# Altium PCB DAP-PCB-REV-4.PcbDoc (part 1 of 4)
Units mil, origin at the board's own origin, x right, y up, seen from the top; angles counter-clockwise.
Board outline 2559.06 x 2559.06 mil, 6 copper layers (L1 (SIG/PWR), L2 (GND), L3 (SIG), L4 (PWR), L5 (GND), L6 (SIG/PWR)), stack 64.976 mil thick; 309 components, 179 nets, 965 pads, 300 vias.
Unrouted connection lines stored in the file: 157.
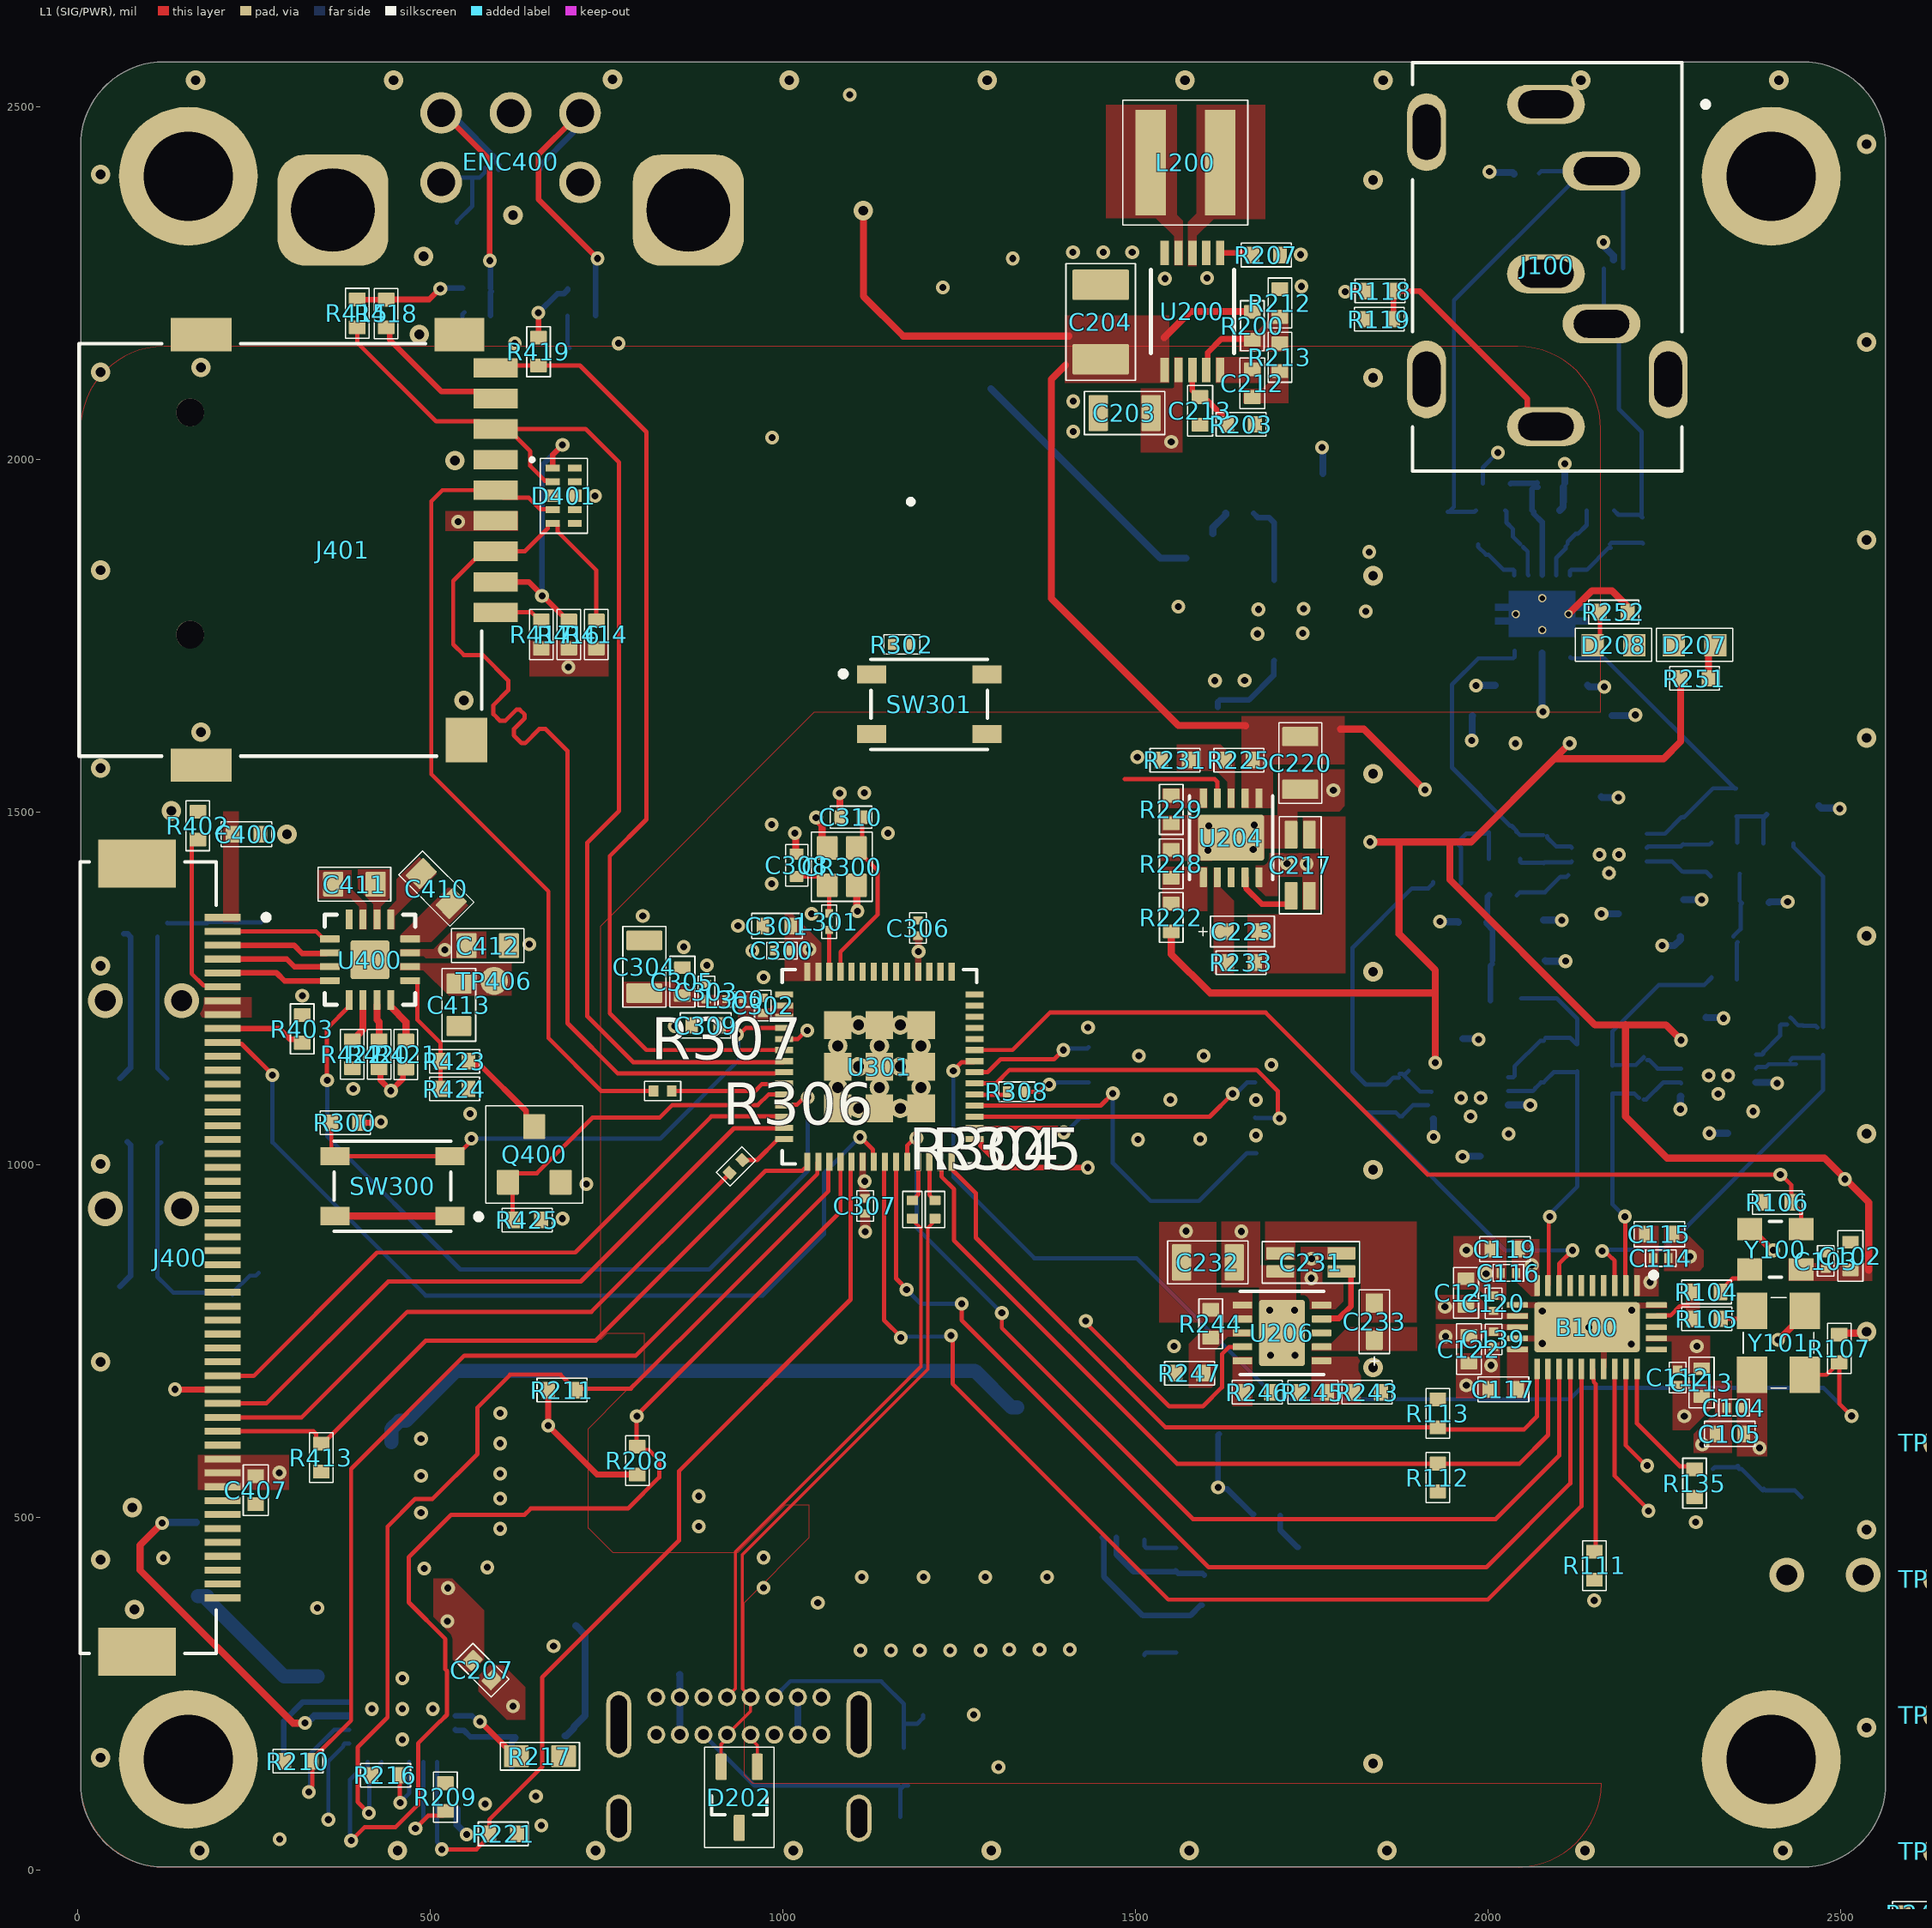
[diagram p0: L1 (SIG/PWR) view]
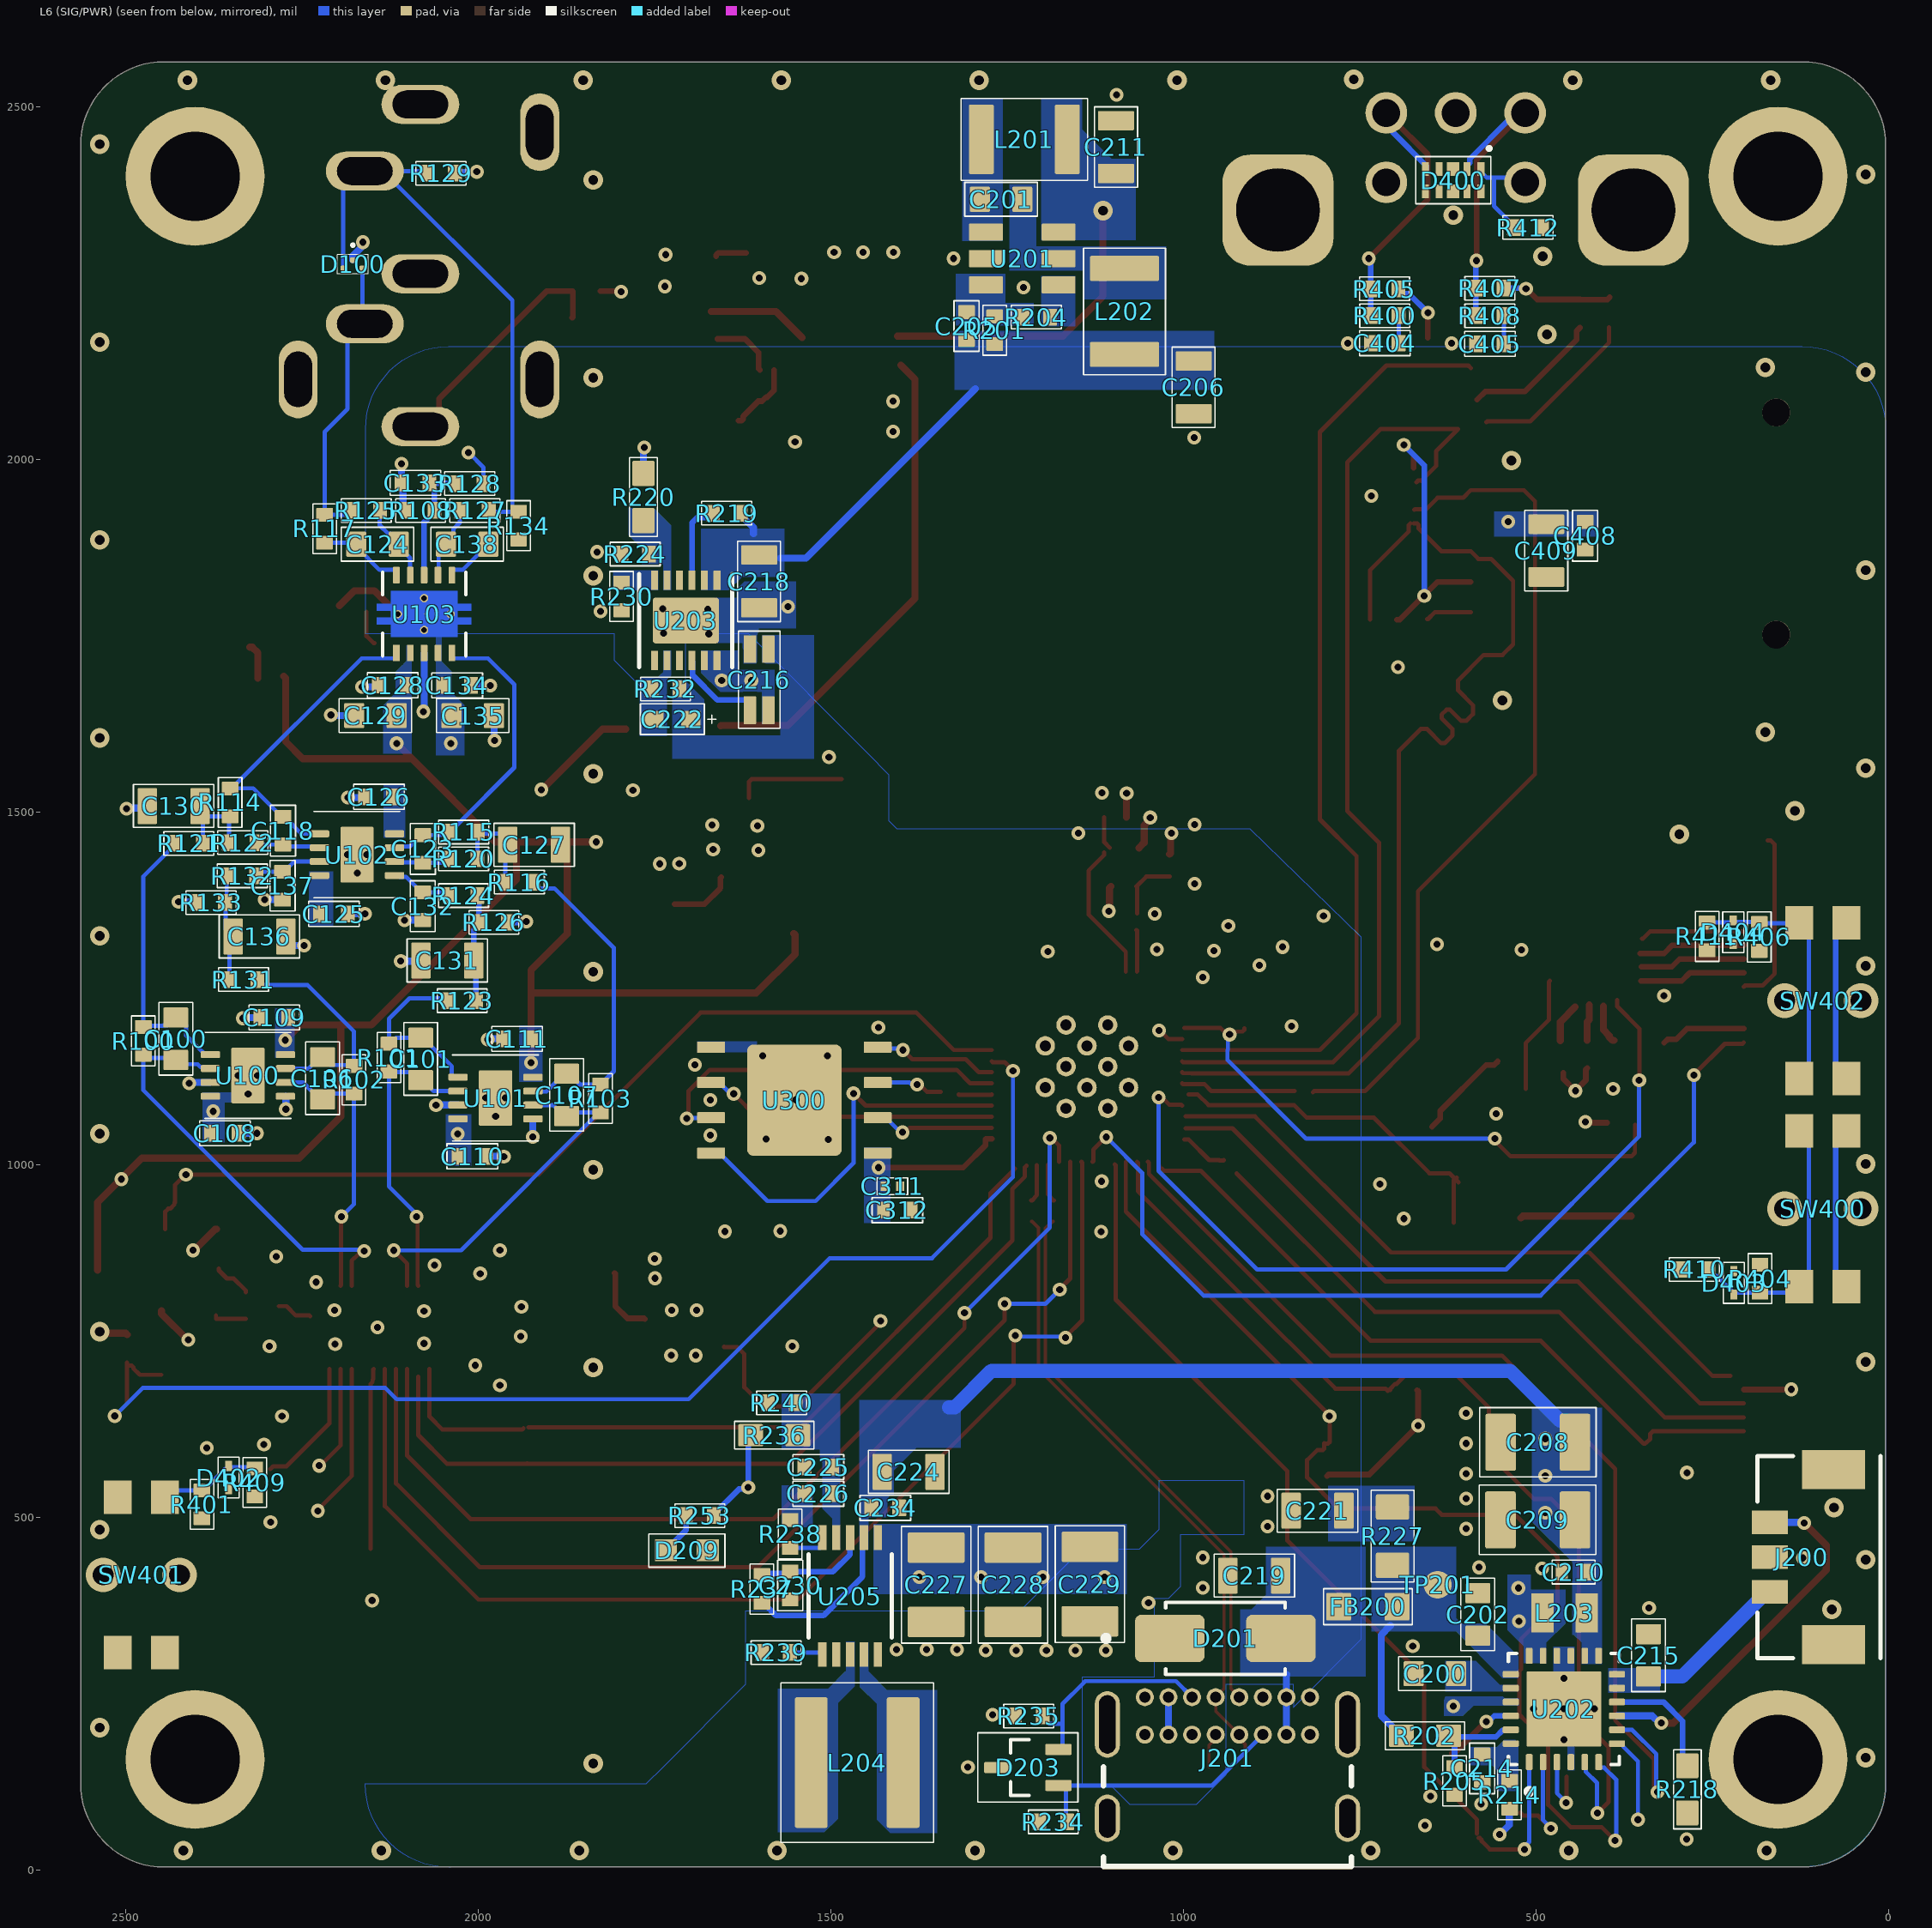
[diagram p1: L6 (SIG/PWR) view, seen from below]
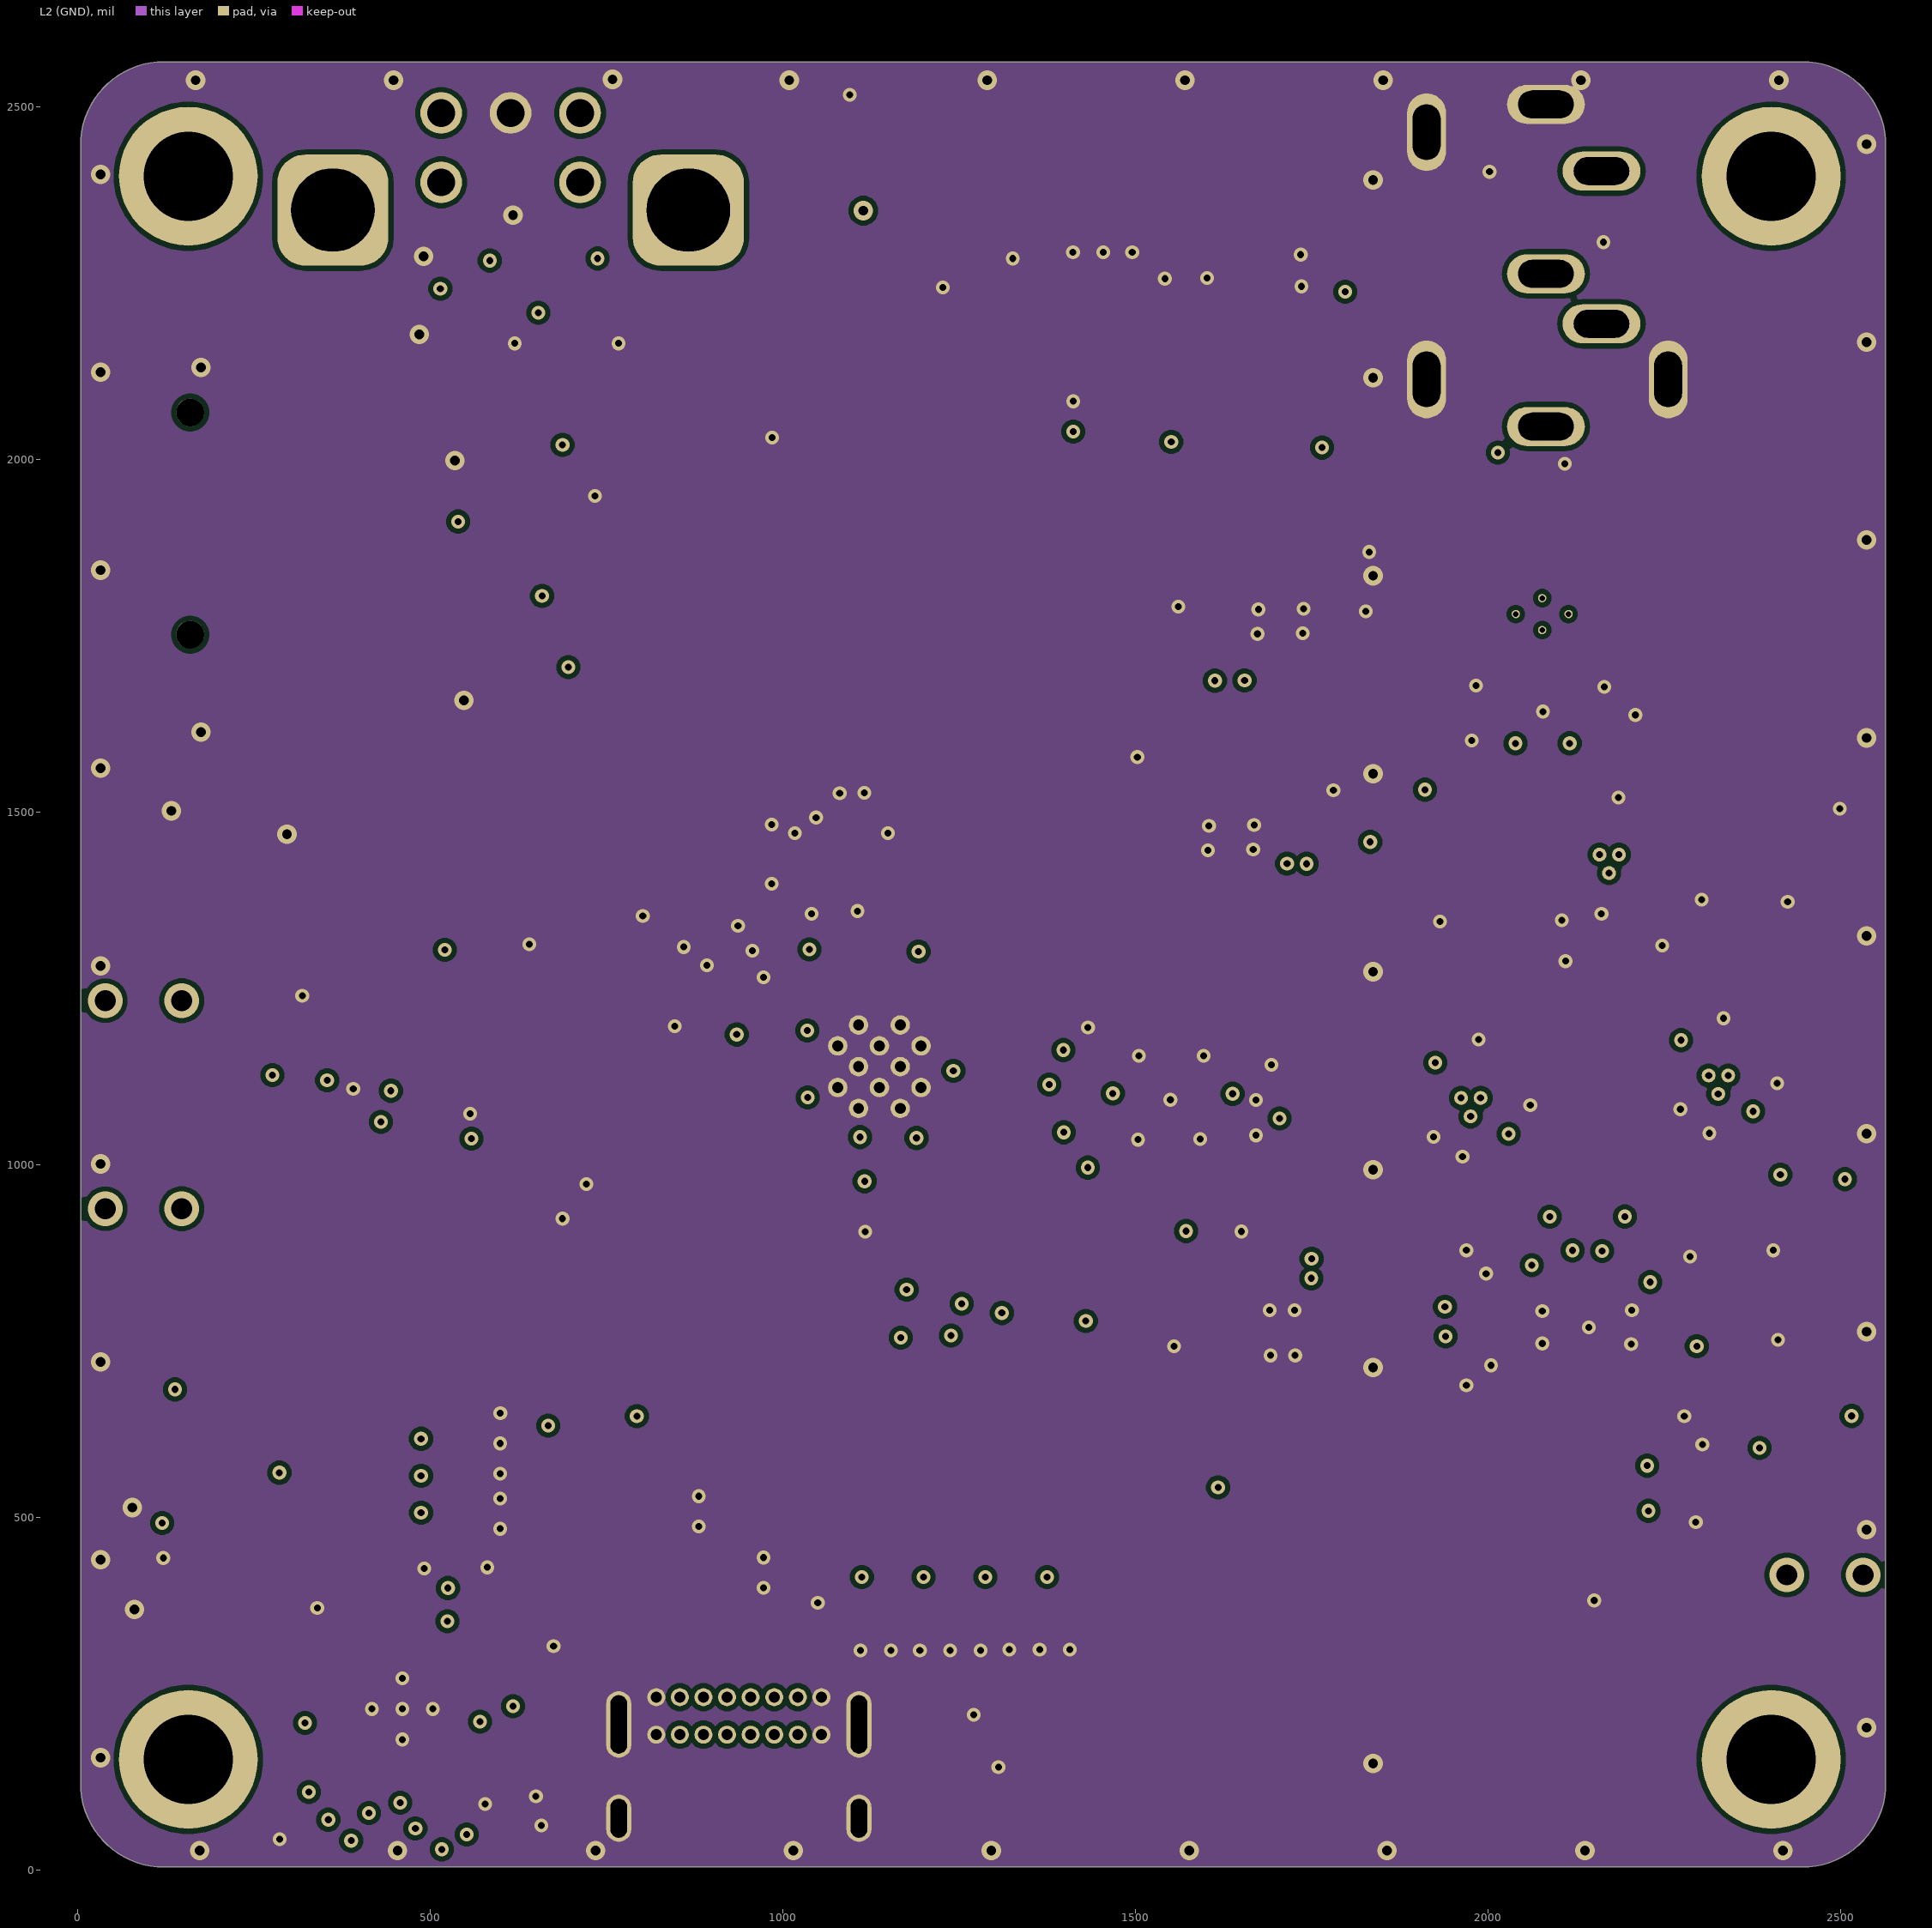
[diagram p2: L2 (GND)]
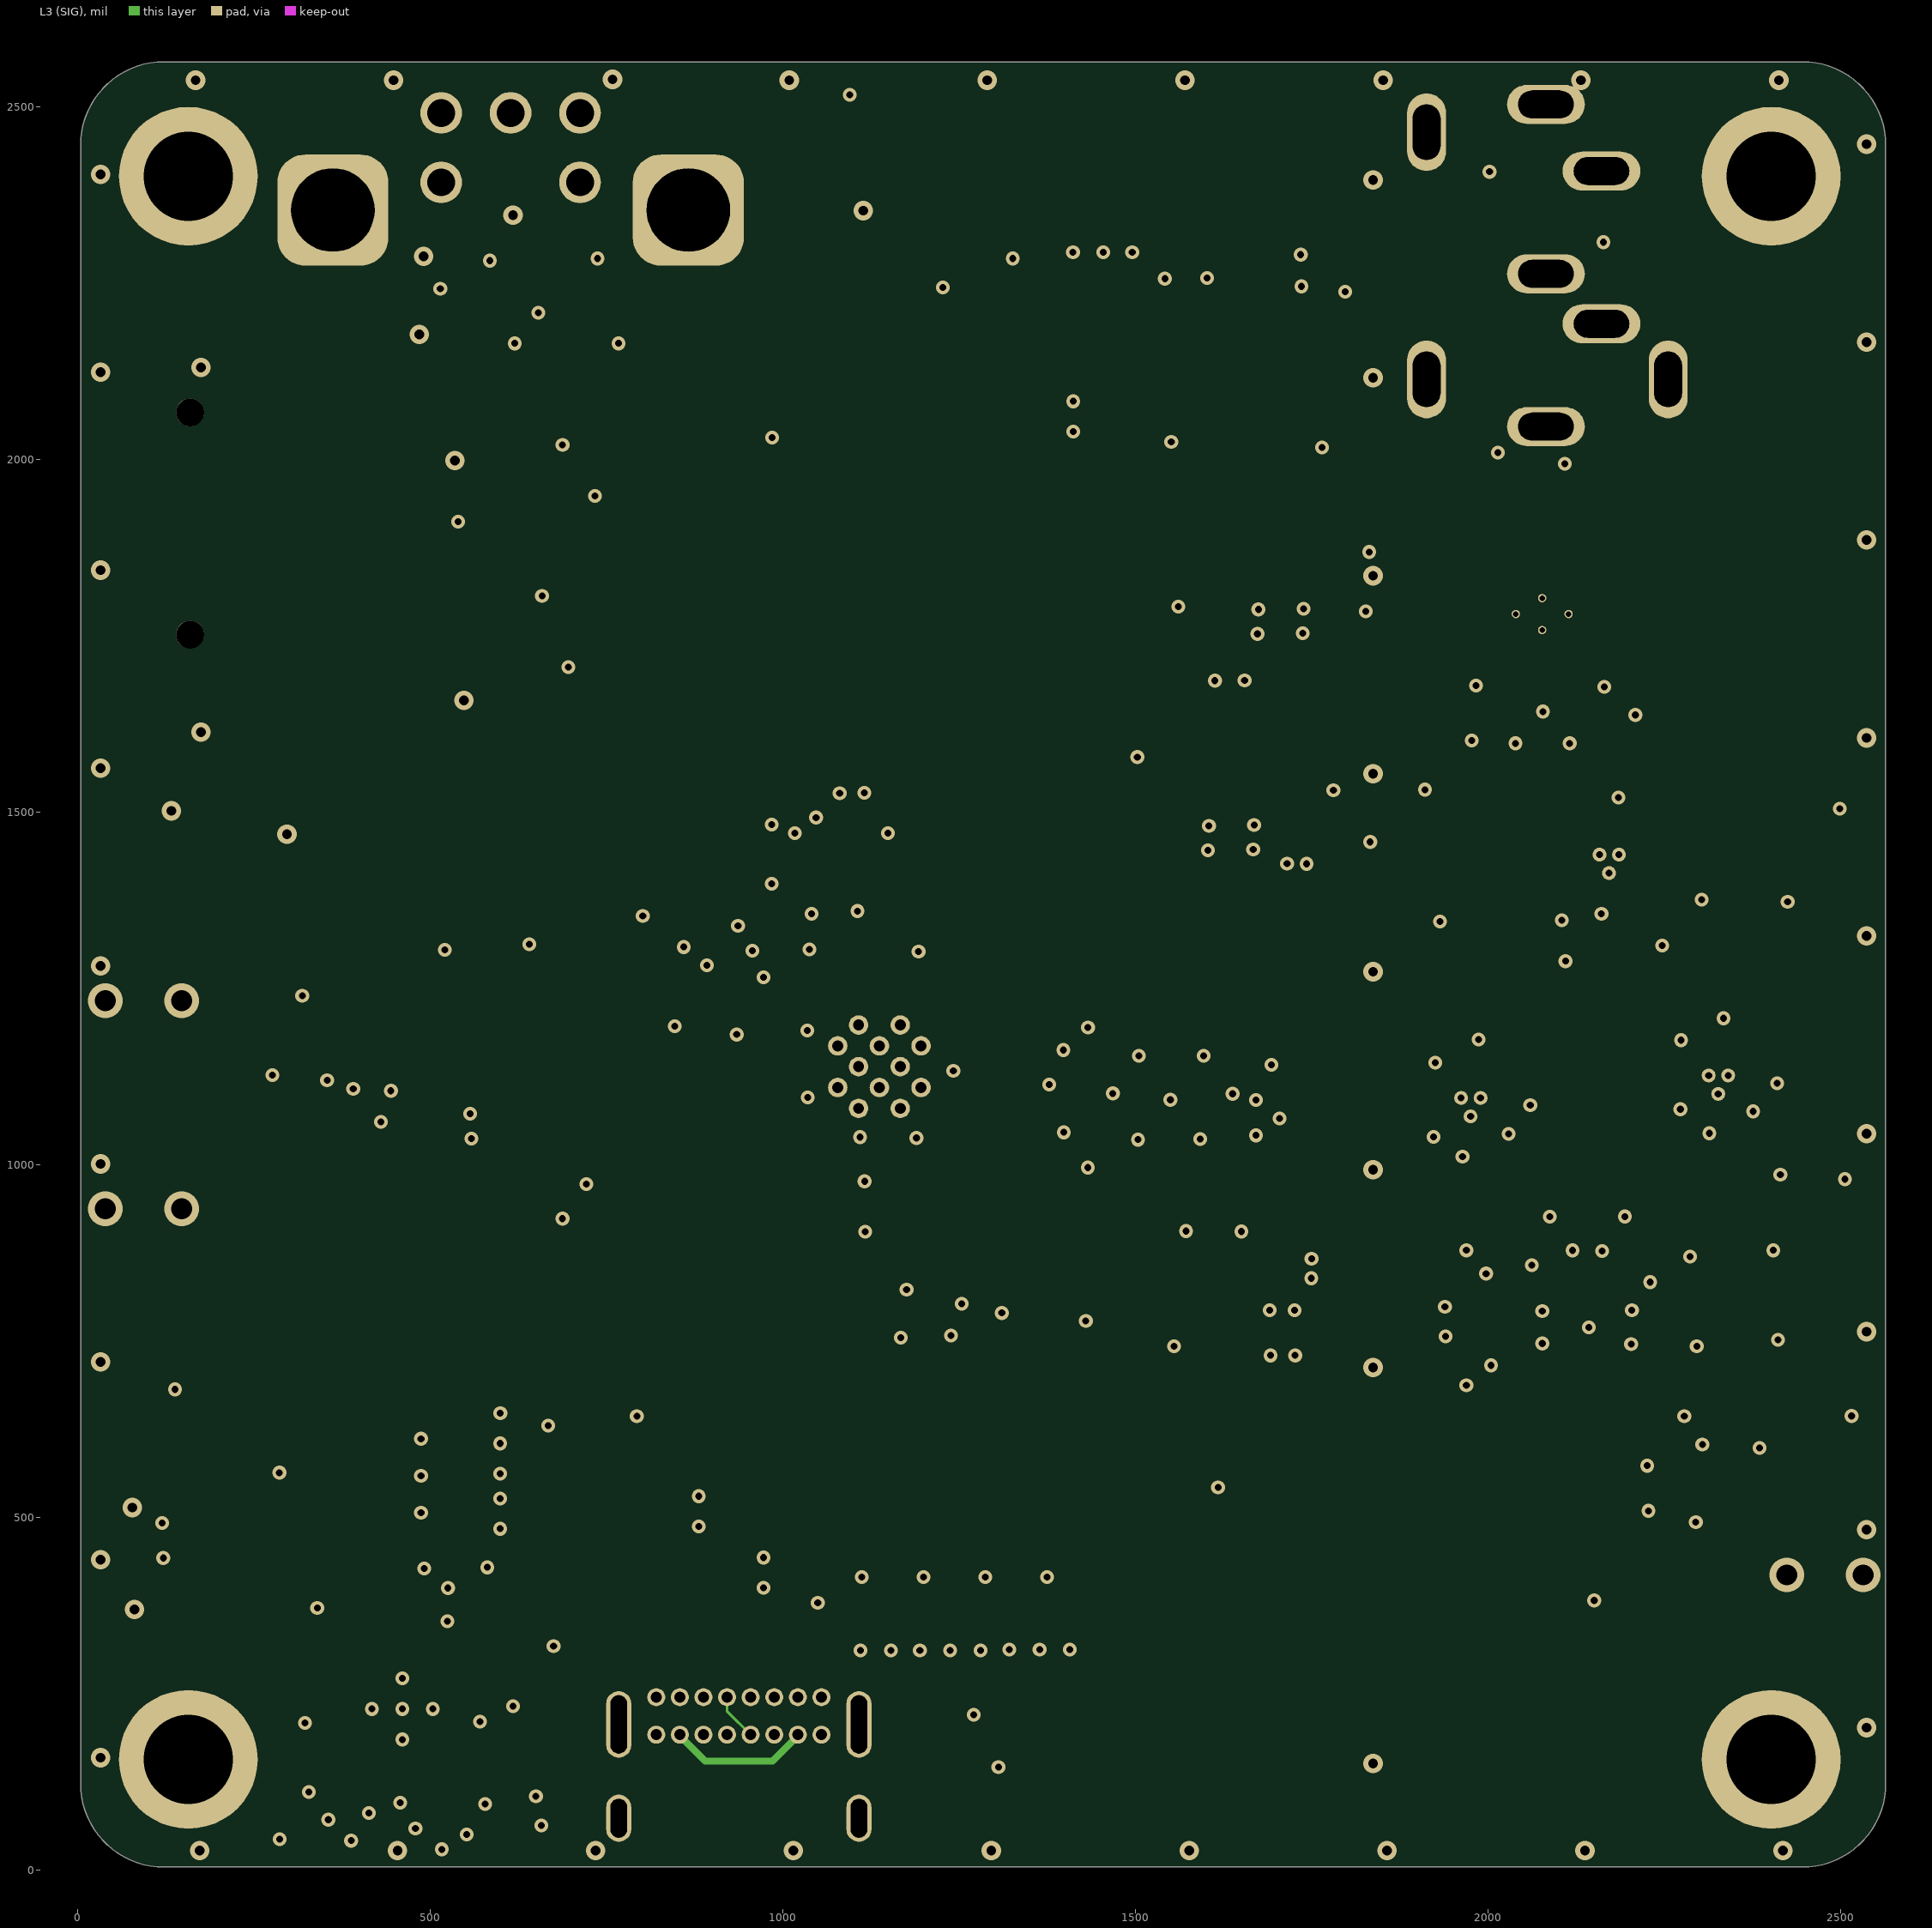
[diagram p3: L3 (SIG)]
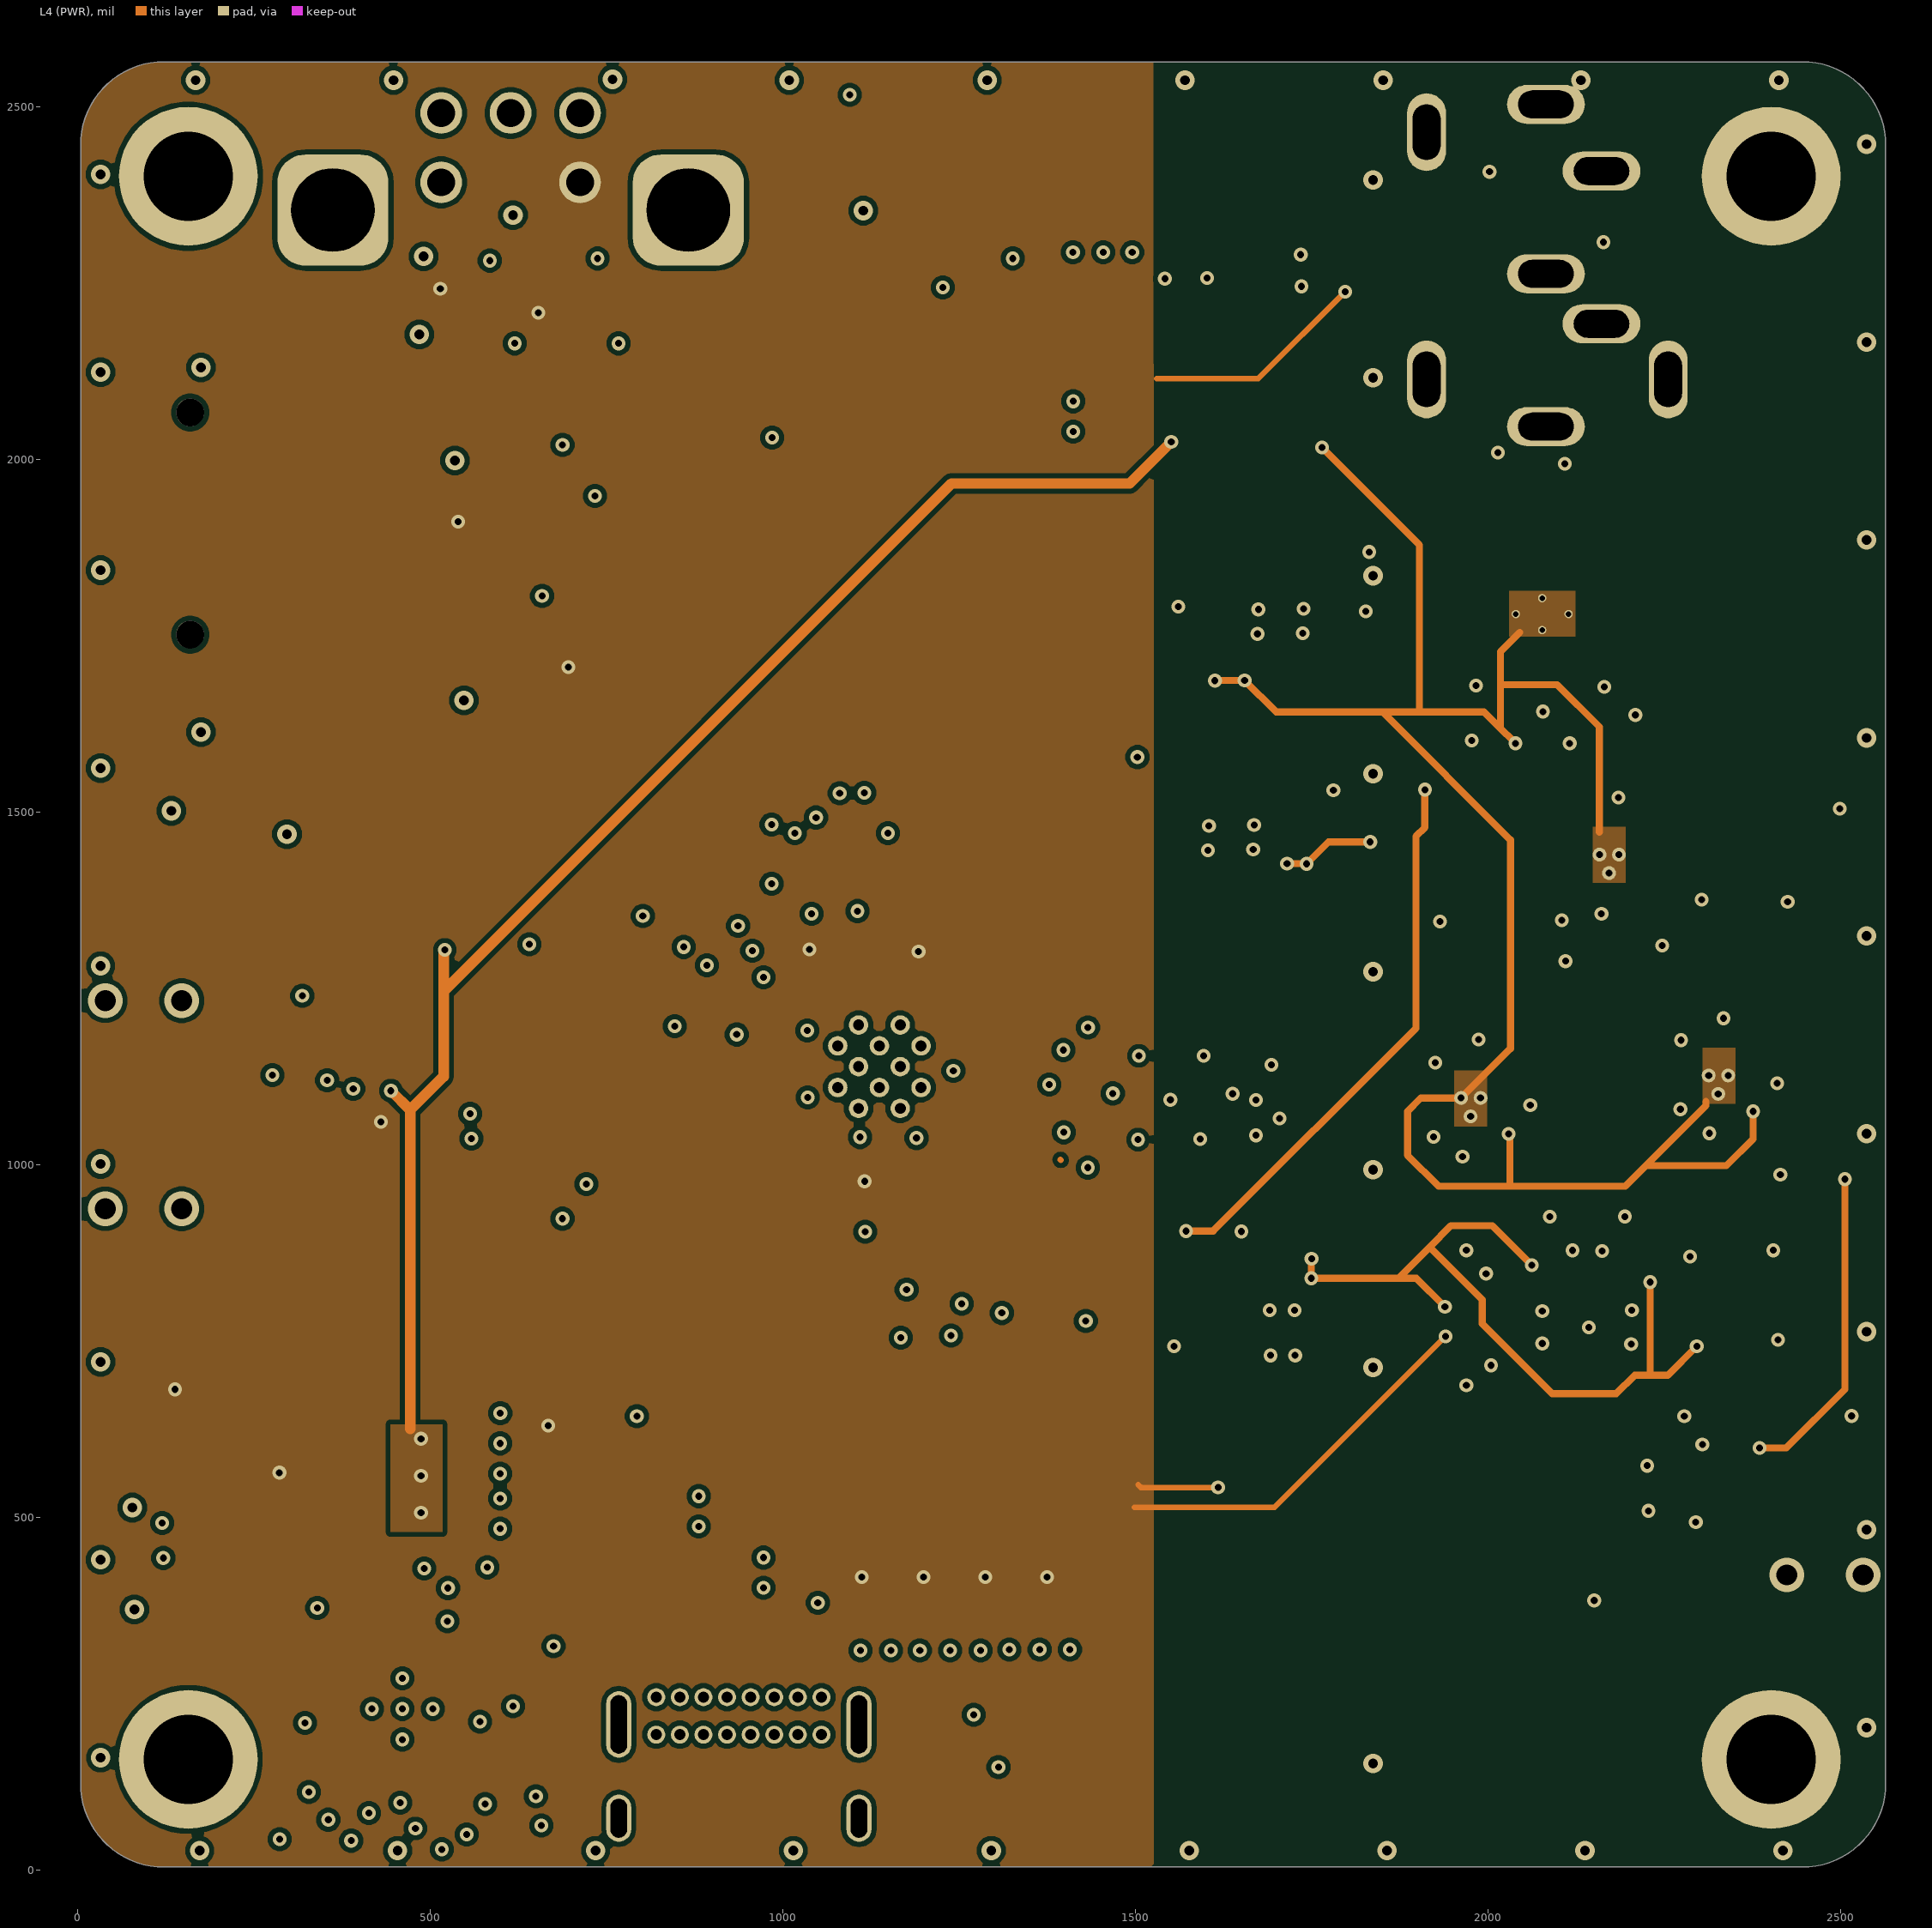
[diagram p4: L4 (PWR)]

## Layer stack, top to bottom
Top Solder: solder mask 1.2205, Solder Resist, Dk 4
L1 (SIG/PWR): signal copper 1.378
Dielectric 1: prepreg 3.9134, 3313, Dk 4.1
L2 (GND): signal copper 0.5984
Dielectric 8: core 3.937, Core-009, Dk 4.6
L3 (SIG): signal copper 0.5984
Dielectric 6: prepreg 8.2835, 7628, Dk 4.4
Dielectric 2: core 27.5591, Core-009, Dk 4.6
Dielectric 7: prepreg 8.2835, 7628, Dk 4.4
L4 (PWR): signal copper 0.5984
Dielectric 4: core 3.937, Core-009, Dk 4.6
L5 (GND): signal copper 0.5984
Dielectric 3: prepreg 3.9134, 3313, Dk 4.1
L6 (SIG/PWR): signal copper 1.378
Bottom Solder: solder mask 1.2205, Solder Resist, Dk 4

## Board outline
4.84,122.95 4.84,2445.79 cw(c122.95,2445.79) 122.95,2563.9 2445.79,2563.9 cw(c2445.79,2445.79) 2563.9,2445.79 2563.9,122.95 cw(c2445.79,122.95) 2445.79,4.84 122.95,4.84 cw(c122.95,122.95)

## Design rules (kind name [scope] priority, off if disabled: settings)
Clearance [All] p1: gap=7 ignorepadtopadclearanceinfootprint=FALSE except(4.72: Arc-Arc Arc-Track Track-Track; 5: SMDPad-SMDPad)
DiffPairsRouting [All] p1: maxlimit=5 minlimit=5 mostfreqgap=5 toplayer_minwidth=4.75 toplayer_maxwidth=4.75 toplayer_prefwidth=4.75 midlayer1_minwidth=3.22 midlayer1_maxwidth=3.22 midlayer1_prefwidth=3.22 midlayer2_minwidth=3.98 midlayer2_maxwidth=3.98 midlayer2_prefwidth=3.98 midlayer3_minwidth=3.98 midlayer3_maxwidth=3.98 midlayer3_prefwidth=3.98 midlayer4_minwidth=3.17 midlayer4_maxwidth=3.17 midlayer4_prefwidth=3.17 bottomlayer_minwidth=4.75 bottomlayer_maxwidth=4.75 bottomlayer_prefwidth=4.75 impedanceprofiledriven=TRUE impedanceprofileid={D838837C-7825-4B87-9FED-7A096DA422F5} impedanceprofilevalue=90.000000 maxuncoupledlength=500
MinimumSolderMaskSliver [All] p1: minsoldermaskwidth=3.15
PlaneConnect [All] p1: planeconnectstyle=Direct reliefexpansion=20 reliefentries=4 reliefconductorwidth=10 reliefairgap=10
PolygonConnect Thermal_Relief [D207] p1: connectstyle=Relief reliefconductorwidth=10 reliefentries=4 polygonreliefangle="90 Angle" airgapwidth=10
PolygonConnect [All] p2: connectstyle=Direct reliefconductorwidth=10 reliefentries=4 polygonreliefangle="90 Angle" airgapwidth=10
RoutingVias [All] p1: holewidth=28 width=50 viastyle="Through Hole" minholewidth=28 minwidth=50 maxholewidth=28 maxwidth=50
SilkToSilkClearance [All] p1: silktosilkclearance=4
SilkToSolderMaskClearance [IsPad] p1: minsilkscreentomaskgap=2.95 clearancetoexposedcopper=TRUE
SolderMaskExpansion [All] p1: expansion=4 istentingtop=FALSE
SupplyNets "Schematic Supply Nets_2" [InNet('+3V3_DIG')] p1: voltage=0.000
SupplyNets "Schematic Supply Nets_4" [InNet('-3V3')] p2: voltage=0.000
SupplyNets "Schematic Supply Nets_3" [InNet('+3V3_DAC')] p3: voltage=0.000
SupplyNets "Schematic Supply Nets" [InNet('+3V3_ANALOG')] p4: voltage=0.000
SupplyNets "Schematic Supply Nets_14" [InNet('-3V9')] p5: voltage=0.000
SupplyNets "Schematic Supply Nets_13" [InNet('VUSB')] p6: voltage=0.000
SupplyNets "Schematic Supply Nets_12" [InNet('+3V9')] p7: voltage=0.000
SupplyNets "Schematic Supply Nets_11" [InNet('SYS')] p8: voltage=0.000
SupplyNets "Schematic Supply Nets_10" [InNet('GND')] p9: voltage=0.000
SupplyNets "Schematic Supply Nets_7" [InNet('VDD_SPI')] p10: voltage=0.000
SupplyNets "Schematic Supply Nets_1" [InNet('+LED')] p11: voltage=0.000
Width [All] p1: maxlimit=100 minlimit=5.98 preferedwidth=7.99 toplayer_minwidth=6 toplayer_prefwidth=8 minimp=50.000000 maximp=50.000000 favimp=50.000000
25 further rules are at their usual default settings.

## Classes and differential pairs
component class DAP-Power-2: C200 C201 C202 C203 C204 C205 C206 C207 C208 C209 C210 C211 C212 C213 C214 C215 C216 C217 C218 C219 C220 C221 C222 C223 C224 C225 C226 C227 C228 C229 C230 C231 C232 C233 C234 D200 D201 D202 D203 D204 D205 D206 D207 D208 D209 FB200 J200 J201 L200 L201 L202 L203 L204 R200 R201 R202 R203 R204 R205 R206 R207 R208 R209 R210 R211 R212 R213 R214 R215 R216 R217 R218 R219 R220 R221 R222 R223 R224 R225 R226 R227 R228 R229 R230 R231 R232 R233 R234 R235 R236 R237 R238 R239 R240 R241 R242 R243 R244 R245 R246 R247 R248 R249 R250 R251 R252 R253 TP200 TP201 TP202 TP203 TP204 TP205 TP206 TP207 TP208 TP209 TP210 TP211 TP212 TP213 TP214 TP215 TP216 TP217 TP218 TP219 TP220 TP221 TP222 U200 U201 U202 U203 U204 U205 U206
component class DAP-Peripherals-4: C400 C404 C405 C407 C408 C409 C410 C411 C412 C413 D400 D401 D402 D403 D404 ENC400 J400 J401 Q400 R400 R401 R402 R403 R404 R405 R406 R407 R408 R409 R410 R411 R412 R413 R414 R415 R416 R417 R418 R419 R420 R421 R422 R423 R424 R425 SW400 SW401 SW402 TP402 TP403 TP404 TP405 TP406 U400
component class DAP-MCU-3: C300 C301 C302 C303 C304 C305 C306 C307 C308 C309 C310 C311 C312 CR300 L300 L301 R300 R301 R302 R303 R304 R305 R306 R307 R308 SW300 SW301 TP300 TP301 TP302 TP303 U300 U301
component class DAP-Audio-1: B100 C100 C101 C102 C103 C104 C105 C106 C107 C108 C109 C110 C111 C112 C113 C114 C115 C116 C117 C118 C119 C120 C121 C122 C123 C124 C125 C126 C127 C128 C129 C130 C131 C132 C133 C134 C135 C136 C137 C138 C139 D100 J100 R100 R101 R102 R103 R104 R105 R106 R107 R108 R111 R112 R113 R114 R115 R116 R117 R118 R119 R120 R121 R122 R123 R124 R125 R126 R127 R128 R129 R131 R132 R133 R134 R135 TP100 TP101 TP102 U100 U101 U102 U103 Y100 Y101
differential pair USB_D: +USB_D_P -USB_D_N

## Components (designator, comment, footprint, x,y, rotation, side; value= is the part's Value field where it differs from the comment)
B100 "DAC Audiophile" QFN40P300X500X80-31N-D 2140.38,770.06 r270 top
C100 "CAP CER 1500PF 50V C0G/NP0 0603" CAP_GCM/R18 2429,1179.04 r90 bottom
C101 "CAP CER 1500PF 50V C0G/NP0 0603" CAP_GCM/R18 2081.87,1150.38 r90 bottom
C102 "CAP CER 1UF 25V X5R 0402" CAP_GRM15 2514,871 r270 top
C103 "CAP CER 0.1UF 25V X5R 0201" CAP_GRM03 2479,864 r270 top
C104 "CAP CER 0.1UF 25V X5R 0201" CAP_GRM03 2349,656 r0 top
C105 "CAP CER 1UF 25V X5R 0402" CAP_GRM15 2343,619 r0 top
C106 "CAP CER 1500PF 50V C0G/NP0 0603" CAP_GCM/R18 2221,1123 r90 bottom
C107 "CAP CER 1500PF 50V C0G/NP0 0603" CAP_GCM/R18 1874.87,1099.38 r90 bottom
C108 "CAP CER 0.1UF 50V X7R 0402" CAP_GCM/R15 2359.38,1045.13 r0 bottom
C109 "CAP CER 0.1UF 50V X7R 0402" CAP_GCM/R15 2289.38,1209.13 r180 bottom
C110 "CAP CER 0.1UF 50V X7R 0402" CAP_GCM/R15 2008.6,1012.38 r0 bottom
C111 "CAP CER 0.1UF 50V X7R 0402" CAP_GCM/R15 1945,1179 r180 bottom
C112 "CAP CER 0.1UF 25V X5R 0201" CAP_GRM03 2269,698.83 r90 top
C113 "CAP CER 1UF 25V X5R 0402" CAP_GRM15 2303,691.68 r90 top
C114 "CAP CER 0.1UF 25V X5R 0201" CAP_GRM03 2245,868 r180 top
C115 "CAP CER 1UF 25V X5R 0402" CAP_GRM15 2243,902 r180 top
C116 "CAP CER 0.1UF 25V X5R 0201" CAP_GRM03 2029,847 r0 top
C117 "CAP CER 4.7UF 6.3V X5R 0402" CAP_GCM/R15 2022,682 r0 top
C118 "CAP CER 2700PF 50V C0G/NP0 0402" CAP_GCM/R15 2277,1474 r270 bottom
C119 "CAP CER 1UF 25V X5R 0402" CAP_GRM15 2024,881 r0 top
C120 "CAP CER 0.1UF 25V X5R 0201" CAP_GRM03 2008,804 r270 top
C121 "CAP CER 1UF 25V X5R 0402" CAP_GRM15 1969,819 r270 top
C122 "CAP CER 1UF 25V X5R 0402" CAP_GRM15 1973,739 r90 top
C123 "CAP CER 2700PF 50V C0G/NP0 0402" CAP_GCM/R15 2078.76,1448 r270 bottom
C124 "CAP CER 1500PF 50V C0G/NP0 0603" CAP_GCM/R18 2142.96,1880 r180 bottom
C125 "CAP CER 0.1UF 50V X7R 0402" CAP_GCM/R15 2204.73,1356 r0 bottom
C126 "CAP CER 0.1UF 50V X7R 0402" CAP_GCM/R15 2141,1522 r180 bottom
C127 "CAP CER 0.013UF 50V C0G/NP0 0805" CAP_GCM/R21 1921,1454 r0 bottom
C128 "CAP CER 0.1UF 50V X7R 0402" CAP_GCM/R15 2121.54,1680.25 r180 bottom
C129 "CAP CER 1UF 25V X7R 0603" CAP_GCM/R18 2146.03,1637.25 r0 bottom
C130 "CAP CER 0.013UF 50V C0G/NP0 0805" CAP_GCM/R21 2432,1509 r180 bottom
C131 "CAP CER 0.013UF 50V C0G/NP0 0805" CAP_GCM/R21 2044,1290 r180 bottom
C132 "CAP CER 2700PF 50V C0G/NP0 0402" CAP_GCM/R15 2078.95,1367 r270 bottom
C133 "CAP CER 0.1UF 50V X7R 0402" CAP_GCM/R15 2089.32,1967 r180 bottom
C134 "CAP CER 0.1UF 50V X7R 0402" CAP_GCM/R15 2030,1680 r0 bottom
C135 "CAP CER 1UF 25V X7R 0603" CAP_GCM/R18 2008.03,1637 r180 bottom
C136 "CAP CER 0.013UF 50V C0G/NP0 0805" CAP_GCM/R21 2310.4,1324 r0 bottom
C137 "CAP CER 2700PF 50V C0G/NP0 0402" CAP_GCM/R15 2277.57,1396 r270 bottom
C138 "CAP CER 1500PF 50V C0G/NP0 0603" CAP_GCM/R18 2015.98,1880 r0 bottom
C139 "CAP CER 0.1UF 25V X5R 0201" CAP_GRM03 2008,753 r90 top
C200 "CAP CER 1UF 25V X7R 0603" CAP_GCM/R18 644,279 r0 bottom
C201 "CAP CER 2.2UF 25V X7R 0603" CAP_GCM/R18 1259,2369 r180 bottom
C202 "CAP CER 2.2UF 25V X7R 0603" CAP_GCM/R18 583,363 r90 bottom
C203 "CAP CER 10UF 10V X7R 0805" CAP_GCM/R21 1485,2066 r0 top
C204 "CAP CER 22UF 25V X7S 1210" CAP_GCM/R32 1451,2195 r270 top
C205 "CAP CER 22PF 50V C0G/NP0 0402" CAP_GCM/R15 1308,2189.27 r270 bottom
C206 "CAP CER 10UF 10V X7R 0805" CAP_GCM/R21 986,2102.39 r90 bottom
C207 "CAP CER 0.033UF 16V X7R 0402" CAP_GCM/R15 574,284 r315 top
C208 "CAP CER 22UF 25V X7S 1210" CAP_GCM/R32 498,607 r180 bottom
C209 "CAP CER 22UF 25V X7S 1210" CAP_GCM/R32 498.2,497 r180 bottom
C210 "CAP CER 0.1UF 50V X7R 0402" CAPC1005X60N 447.27,423 r180 bottom
C211 "CAP CER 10UF 10V X7R 0805" CAP_GCM/R21 1096,2443 r270 bottom
C212 "CAP CER 1500PF 50V C0G/NP0 0402" CAP_GCM/R15 1666,2108.27 r90 top
C213 "CAP CER 0.1UF 50V X7R 0402" CAP_GCM/R15 1592,2069 r90 top
C214 "CAP CER 1UF 35V X5R 0402" CAP_GCM/R15 577,144.73 r90 bottom
C215 "CAP CER 1UF 25V X7R 0603" CAP_GCM/R18 341,305 r90 bottom
C216 "CAP CER 10UF 10V X7R 0805" "CAPC2012X140N - CUT" 1602,1688 r270 bottom
C217 "CAP CER 10UF 10V X7R 0805" "CAPC2012X140N - CUT" 1734,1425 r270 top
C218 "CAP CER 10UF 10V X7R 0805" CAP_GCM/R21 1602,1827.4 r90 bottom
C219 "CAP CER 4.7UF 16V X7R 0805" CAP_GCM/R21 900,418 r180 bottom
C220 "CAP CER 10UF 10V X7R 0805" CAP_GCM/R21 1734,1570 r90 top
C221 "CAP CER 4.7UF 16V X7R 0805" CAP_GCM/R21 810.31,510 r180 bottom
C222 "CAP TANT 2.2UF 20% 16V 0603" CAP_298D225X0016M2T 1725,1632 r0 bottom
C223 "CAP TANT 2.2UF 20% 16V 0603" CAP_298D225X0016M2T 1652,1331 r0 top
C224 "CAP CER 10UF 10V X7R 0805" CAP_GCM/R21 1390,565 r0 bottom
C225 "CAP CER 100PF 50V C0G/NP0 0402" CAP_GCM/R15 1518,572 r0 bottom
C226 "CAP CER 1500PF 50V C0G/NP0 0402" CAP_GCM/R15 1518,534 r0 bottom
C227 "CAP CER 22UF 25V X7S 1210" CAP_GCM/R32 1351,405 r90 bottom
C228 "CAP CER 22UF 25V X7S 1210" CAP_GCM/R32 1242,405 r90 bottom
C229 "CAP CER 22UF 25V X7S 1210" CAP_GCM/R32 1133,406 r90 bottom
C230 "CAP CER 0.1UF 50V X7R 0402" CAP_GCM/R15 1558,404 r90 bottom
C231 "CAP CER 10UF 10V X7R 0805" "CAPC2012X140N - CUT" 1749,862 r0 top
C232 "CAP CER 10UF 10V X7R 0805" CAP_GCM/R21 1603,862 r180 top
C233 "CAP TANT 2.2UF 20% 16V 0603" CAP_298D225X0016M2T 1839,778 r90 top
C234 "CAP CER 0.1UF 50V X7R 0402" CAP_GCM/R15 1423,514 r0 bottom
C300 "CAP CER 10000PF 10V X7R 0201" CAP_GRM03 999,1304 r0 top
C301 "CAP CER 1UF 25V X5R 0402" CAP_GRM15 992,1339 r0 top
C302 "CAP CER 0.1UF 25V X5R 0201" CAP_GRM03 972,1226 r270 top
C303 "CAP CER 0.1UF 25V X5R 0201" CAP_GRM03 892,1246 r270 top
C304 "CAP CER 10UF 10V X7R 0805" CAP_GCM/R21 804,1281 r270 top
C305 "CAP CER 1UF 25V X5R 0402" CAP_GRM15 858,1260 r270 top
C306 "CAP CER 0.1UF 25V X5R 0201" CAP_GRM03 1192,1336 r270 top
C307 "CAP CER 0.1UF 25V X5R 0201" CAP_GRM03 1117,942 r90 top
C308 "CAP CER 12PF 50V C0G/NP0 0402" CAP_GJM15 1020,1425 r90 top
C309 "CAP CER 1UF 25V X5R 0402" CAP_GRM15 891,1198 r0 top
C310 "CAP CER 12PF 50V C0G/NP0 0402" CAP_GJM15 1097,1493 r180 top
C311 "CAP CER 0.1UF 25V X5R 0201" CAP_GRM03 1413,970 r0 bottom
C312 "CAP CER 1UF 25V X5R 0402" CAP_GRM15 1406,936 r0 bottom
C400 "CAP CER 0.1UF 50V X7R 0402" CAP_GCM/R15 240,1469 r180 top
C404 "CAP CER 10000PF 16V X7R 0402" CAP_GCM/R15 715,2165 r180 bottom
C405 "CAP CER 10000PF 16V X7R 0402" CAP_GCM/R15 566,2164 r180 bottom
C407 "CAP CER 0.1UF 50V X7R 0402" CAP_GCM/R15 253,539 r90 top
C408 "CAP CER 0.1UF 50V X7R 0402" CAP_GCM/R15 431,1892 r90 bottom
C409 "CAP CER 10UF 10V X7R 0805" CAP_GCM/R21 486,1871 r90 bottom
C410 "CAP CER 1UF 25V X7R 0603" CAP_GCM/R18 509,1392 r315 top
C411 "CAP CER 1UF 25V X7R 0603" CAP_GCM/R18 393,1398 r180 top
C412 "CAP CER 1UF 25V X7R 0603" CAP_GCM/R18 581.98,1311 r0 top
C413 "CAP CER 1UF 25V X7R 0603" CAP_GCM/R18 541,1227 r270 top
CR300 "CRYSTAL 40.0000MHZ 10PF SMD" CRYST_ECS-400 1084,1423 r90 top
D100 "TVS DIODE 3.6VWM 8.4VC 3X2SON" IC_ESD122DMXR 2178,2277 r270 bottom
D200 "LED GREEN CLEAR CHIP SMD" LEDM1608X80 427,-224 r180 bottom
D201 "TVS DIODE 7VWM 12VC SMA" DIOM5226X230N 941,329 r180 bottom
D202 "TVS DIODE 5.5VWM 12.4VC SC703" SOT65P210X110-3N 938.59,103.69 r270 top
D203 "TVS DIODE 5.5VWM 12.4VC SC703" SOT65P210X110-3N 1221,146 r0 bottom
D204 "LED GREEN CLEAR CHIP SMD" LEDM1608X80 2800,724 r90 top
D205 "LED GREEN CLEAR CHIP SMD" LEDM1608X80 2687,-107.53 r270 top
D206 "LED GREEN CLEAR CHIP SMD" LEDM1608X80 -95,4099 r270 top
D207 "LED GREEN CLEAR CHIP SMD" LEDM1608X80 2293,1737 r0 top
D208 "LED GREEN CLEAR CHIP SMD" LEDM1608X80 2178,1737 r0 top
D209 "LED GREEN CLEAR CHIP SMD" LEDM1608X80 1704.53,454 r0 bottom
D400 "TVS DIODE 5VWM 10VC 10UDFN" UDFN10_517BB_ONS 618,2396 r270 bottom
D401 "TVS DIODE 5VWM 10VC 10UDFN" UDFN10_517BB_ONS 689.75,1948.69 r0 top
D402 "TVS DIODE 5VWM 12.3VC SOD923" "DIOM1006X40N - onsemi" 2354,557 r270 bottom
D403 "TVS DIODE 5VWM 12.3VC SOD923" "DIOM1006X40N - onsemi" 220,833 r90 bottom
D404 "TVS DIODE 5VWM 12.3VC SOD923" "DIOM1006X40N - onsemi" 221,1330 r270 bottom
ENC400 "ENCODER MECH QUAD RGH ANG PC PIN" EN12-VS_TTE 516,2147.43 r180 top
FB200 "FERRITE BEAD 120 OHM 0805 1LN" WE-CBF_0805_W4.0 739,374 r180 bottom
J100 "CONN JACK STEREO 3.5MM R/A" CUI_SJ1-3535NS 1922.26,2143.49 r270 top
J200 "CONN HEADER SMD R/A 3POS 1.25MM" CONN_505567_03_MOL 99.93,444.21 r270 bottom
J201 "CONN RCPT USB2.0 TYPE C 16+8POS" GCT_USB4085-GF-A_REVA4 938,74 r180 bottom
J400 "CONN FFC BOTTOM 50POS 0.5MM R/A" AMPHENOL_F32D-1A7Y1-21050 84.74,868.72 r270 top
J401 "CONN MICROSD CARD R/A SMD" CUI_MSD-1-A 288,1872 r270 top
L200 "FIXED IND 6.8UH 4A 74.1 MOHM SMD" IND_SRP4030FA 1571,2421 r90 top
L201 "FIXED IND 22UH 300MA 810 MOHM" IND_LQW32FT220M2HL 1226,2454 r0 bottom
L202 "FIXED IND 22UH 300MA 810 MOHM" IND_LQW32FT220M2HL 1084,2210 r270 bottom
L203 "FIXED IND 1UH 2A 95 MOHM SMD" INDC2012X100N 460,365 r180 bottom
L204 "FIXED IND 18UH 4.5A 62.5 MOHM" IND_XGL5050 1463,153 r180 bottom
L300 "FIXED IND 2NH 600MA 120 MOHM SMD" IND_LQP03HQ2N0B02D 932.19,1235 r180 top
L301 "FIXED IND 24NH 140MA 2.3 OHM SMD" IND_LQP03HQ2N0B02D 1066,1345 r270 top
Q400 "MOSFET N-CH 60V 115MA SOT23" SOT-23_MCC 648,1015 r0 top
R100 "RES SMD 499 OHM 0.1% 1/16W 0402" RC_0402_YAG 2475,1176 r90 bottom
R101 "RES SMD 499 OHM 0.1% 1/16W 0402" RC_0402_YAG 2126.87,1152.38 r90 bottom
R102 "RES SMD 499 OHM 0.1% 1/16W 0402" RC_0402_YAG 2176.38,1120.82 r90 bottom
R103 "RES SMD 499 OHM 0.1% 1/16W 0402" RC_0402_YAG 1826.87,1094.38 r90 bottom
R104 "RES 22 OHM 1% 1/16W 0402" RC_0402_YAG 2310,820 r180 top
R105 "RES 22 OHM 1% 1/16W 0402" RC_0402_YAG 2310.32,782 r0 top
R106 "RES SMD 10K OHM 1% 1/16W 0402" RC_0402_YAG 2410.32,947 r0 top
R107 "RES SMD 10K OHM 1% 1/16W 0402" RC_0402_YAG 2498,740 r270 top
R108 "RES SMD 49.9KOHM 0.1% 1/16W 0402" RC_0402_YAG 2082,1928 r180 bottom
R111 "RES SMD 10K OHM 1% 1/16W 0402" RC_0402_YAG 2151,432 r90 top
R112 "RES SMD 10K OHM 1% 1/16W 0402" RC_0402_YAG 1929,557 r90 top
R113 "RES SMD 10K OHM 1% 1/16W 0402" RC_0402_YAG 1929,648 r270 top
R114 "RES SMD 220 OHM 0.1% 1/16W 0402" RC_0402_YAG 2352,1514 r90 bottom
R115 "RES SMD 220 OHM 0.1% 1/16W 0402" RC_0402_YAG 2020.76,1472 r0 bottom
R116 "RES SMD 499 OHM 0.1% 1/16W 0402" RC_0402_YAG 1942,1401 r0 bottom
R117 "RES SMD 499 OHM 0.1% 1/16W 0402" RC_0402_YAG 2218,1902 r90 bottom
R118 "RES SMD 100K OHM 0.1% 1/16W 0402" RC_0402_YAG 1847,2239 r180 top
R119 "RES SMD 10K OHM 1% 1/16W 0402" RC_0402_YAG 1846,2199 r0 top
R120 "RES SMD 681 OHM 0.1% 1/16W 0402" RC_0402_YAG 2021,1434 r0 bottom
R121 "RES SMD 499 OHM 0.1% 1/16W 0402" RC_0402_YAG 2410.44,1456 r180 bottom
R122 "RES SMD 681 OHM 0.1% 1/16W 0402" RC_0402_YAG 2334,1457 r180 bottom
R123 "RES SMD 499 OHM 0.1% 1/16W 0402" RC_0402_YAG 2023,1233 r180 bottom
R124 "RES SMD 681 OHM 0.1% 1/16W 0402" RC_0402_YAG 2021,1382 r0 bottom
R125 "RES SMD 4.7 OHM 0.1% 1/16W 0402" RC_0402_YAG 2159,1928 r0 bottom
R126 "RES SMD 220 OHM 0.1% 1/16W 0402" RC_0402_YAG 1978,1344 r0 bottom
R127 "RES SMD 4.7 OHM 0.1% 1/16W 0402" RC_0402_YAG 2005,1928 r180 bottom
R128 "RES SMD 54.9KOHM 0.1% 1/16W 0402" RC_0402_YAG 2012.32,1966 r0 bottom
R129 "RES SMD 10K OHM 1% 1/16W 0402" RC_0402_YAG 2053,2406 r0 bottom
R131 "RES SMD 499 OHM 0.1% 1/16W 0402" RC_0402_YAG 2333,1263 r0 bottom
R132 "RES SMD 681 OHM 0.1% 1/16W 0402" RC_0402_YAG 2334.57,1410 r180 bottom
R133 "RES SMD 220 OHM 0.1% 1/16W 0402" RC_0402_YAG 2379,1372 r180 bottom
R134 "RES SMD 499 OHM 0.1% 1/16W 0402" RC_0402_YAG 1943,1906.32 r90 bottom
R135 "RES SMD 10K OHM 1% 1/16W 0402" RC_0402_YAG 2293,549 r270 top
R200 "RES 220K OHM 0.1% 1/16W 0402" RC_0402_YAG 1666,2189.69 r90 top
R201 "RES SMD 309K OHM 0.1% 1/16W 0402" RC_0402_YAG 1268,2183.32 r270 bottom
R202 "RES SMD 274K OHM 0.5% 1/10W 0603" RC_0603_YAG 658,191 r180 bottom
R203 "RES SMD 54.9KOHM 0.1% 1/16W 0402" RC_0402_YAG 1650,2050 r180 top
R204 "RES SMD 100K OHM 0.1% 1/16W 0402" RC_0402_YAG 1209,2202 r0 bottom
R205 "RES SMD 100K OHM 0.1% 1/16W 0402" RC_0402_YAG 616,127 r90 bottom
R206 "RES SMD 1K OHM 0.1% 1/16W 0402" RC_0402_YAG 371,-274 r180 bottom
R207 "RES SMD 49.9KOHM 0.1% 1/16W 0402" RC_0402_YAG 1685.68,2290 r180 top
R208 "RES SMD 10K OHM 1% 1/16W 0402" RC_0402_YAG 794,581 r270 top
R209 "RES SMD 10K OHM 1% 1/16W 0402" RC_0402_YAG 522,104 r90 top
R210 "RES SMD 10K OHM 1% 1/16W 0402" RC_0402_YAG 313,155 r180 top
R211 "RES SMD 10K OHM 1% 1/16W 0402" RC_0402_YAG 687.32,681 r180 top
R212 "RES SMD 100K OHM 0.1% 1/16W 0402" RC_0402_YAG 1705,2222 r270 top
R213 "RES SMD 15K OHM 0.1% 1/16W 0402" RC_0402_YAG 1705,2145 r90 top
R214 "RES 5K OHM 1% 1/16W 0402" RC_0402_YAG 538,107.32 r90 bottom
R215 "RES SMD 9.88KOHM 0.5% 1/16W 0402" RC_0402_YAG 461,-131.32 r90 bottom
R216 "RES SMD 10K OHM 1% 1/16W 0402" RC_0402_YAG 437,135 r0 top
R217 "RES 270 OHM 1% 1/10W 0603" RC_0603_YAG 656,162 r0 top
R218 "RES 500 OHM 0.1% 1/10W 0603" RC_0603_YAG 286,115 r270 bottom
R219 "RES 88.7K OHM 1% 1/16W 0402" RC_0402_YAG 1648,1924 r180 bottom
R220 "RES SMD 135K OHM 0.1% 1/10W 0603" RC_0603_YAG 1766,1947 r270 bottom
R221 "RES SMD 10K OHM 1% 1/16W 0402" RC_0402_YAG 604,52 r180 top
R222 "RES 909K OHM 1% 1/16W 0402" RC_0402_YAG 1551,1351 r270 top
R223 "RES SMD 10K OHM 1% 1/16W 0402" RC_0402_YAG 3697,1913 r180 top
R224 "RES SMD 15K OHM 0.1% 1/16W 0402" RC_0402_YAG 1777.68,1866 r180 bottom
R225 "RES SMD 90.9KOHM 0.1% 1/16W 0402" RC_0402_YAG 1647,1574 r0 top
R226 "RES SMD 49.9KOHM 0.1% 1/16W 0402" RC_0402_YAG 6527,1354 r90 bottom
R227 "RES 0.5 OHM 1% 1/4W 0805" RC_0805_YAG 704,474 r90 bottom
R228 "RES SMD 100K OHM 0.1% 1/16W 0402" RC_0402_YAG 1551,1427 r270 top
R229 "RES SMD 1K OHM 0.1% 1/16W 0402" RC_0402_YAG 1551,1504 r90 top
R230 "RES SMD 15.4KOHM 0.1% 1/16W 0402" RC_0402_YAG 1797,1806 r90 bottom
R231 "RES SMD 49.9KOHM 0.1% 1/16W 0402" RC_0402_YAG 1556.32,1574 r0 top
R232 "RES SMD 33.2KOHM 0.1% 1/16W 0402" RC_0402_YAG 1734.68,1675 r0 bottom
R233 "RES SMD 33.2KOHM 0.1% 1/16W 0402" RC_0402_YAG 1650,1287 r180 top
R234 "RES SMD 5.1K OHM 0.1% 1/16W 0402" RC_0402_YAG 1185,69 r180 bottom
R235 "RES SMD 5.1K OHM 0.1% 1/16W 0402" RC_0402_YAG 1219.69,219 r180 bottom
R236 "RES 172K OHM 0.1% 1/10W 0603" RC_0603_YAG 1580.46,617 r180 bottom
R237 "RES SMD 54.9KOHM 0.1% 1/16W 0402" RC_0402_YAG 1598,399 r90 bottom
R238 "RES SMD 49.9KOHM 0.1% 1/16W 0402" RC_0402_YAG 1558,477 r90 bottom
R239 "RES SMD 100K OHM 0.1% 1/16W 0402" RC_0402_YAG 1578,309 r180 bottom
R240 "RES SMD 100K OHM 0.1% 1/16W 0402" RC_0402_YAG 1570,663 r180 bottom
R241 "RES SMD 100K OHM 0.1% 1/16W 0402" RC_0402_YAG 1794,3346.69 r90 top
R242 "RES SMD 10K OHM 1% 1/16W 0402" RC_0402_YAG 3699,3053 r180 top
R243 "RES 909K OHM 1% 1/16W 0402" RC_0402_YAG 1828.68,678 r0 top
R244 "RES SMD 90.9KOHM 0.1% 1/16W 0402" RC_0402_YAG 1607,775 r90 top
R245 "RES SMD 100K OHM 0.1% 1/16W 0402" RC_0402_YAG 1752,678 r0 top
R246 "RES SMD 1K OHM 0.1% 1/16W 0402" RC_0402_YAG 1673,678 r180 top
R247 "RES SMD 49.9KOHM 0.1% 1/16W 0402" RC_0402_YAG 1577,705 r0 top
R248 "RES SMD 33.2KOHM 0.1% 1/16W 0402" RC_0402_YAG 3829,3073 r90 top
R249 "RES SMD 1K OHM 0.1% 1/16W 0402" RC_0402_YAG 2609,-61 r0 top
R250 "RES SMD 1K OHM 0.1% 1/16W 0402" RC_0402_YAG -96,4002.32 r270 top
R251 "RES SMD 1K OHM 0.1% 1/16W 0402" RC_0402_YAG 2293,1690 r180 top
R252 "RES SMD 1K OHM 0.1% 1/16W 0402" RC_0402_YAG 2178.32,1784 r0 top
R253 "RES SMD 1K OHM 0.1% 1/16W 0402" RC_0402_YAG 1686,503 r180 bottom
R300 "RES SMD 10K OHM 1% 1/16W 0402" RC_0402_YAG 380,1060 r0 top
R301 "RES SMD 10K OHM 1% 1/16W 0402" RC_0402_YAG 4028.32,-1834 r180 bottom
R302 "RES 1K OHM 1% 1/20W 0201" RC_0201_YAG 1169,1738 r0 top
R303 "RES 1M OHM 1% 1/20W 0201" RC_0201_YAG 1745.2,3412 r180 top
R304 "RES 22 OHM 1% 1/20W 0201" RC_0201_YAG 1184,937 r90 top
R305 "RES 22 OHM 1% 1/20W 0201" RC_0201_YAG 1216,937 r90 top
R306 "RES 22 OHM 1% 1/20W 0201" RC_0201_YAG 934,998 r45 top
R307 "RES 22 OHM 1% 1/20W 0201" RC_0201_YAG 830,1105 r0 top
R308 "RES 22 OHM 1% 1/20W 0201" RC_0201_YAG 1332,1104 r0 top
R400 "RES SMD 10K OHM 1% 1/16W 0402" RC_0402_YAG 715,2204 r180 bottom
R401 "RES SMD 10K OHM 1% 1/16W 0402" RC_0402_YAG 2392,519 r90 bottom
R402 "RES SMD 10K OHM 1% 1/16W 0402" RC_0402_YAG 171,1481 r270 top
R403 "RES SMD 10K OHM 1% 1/16W 0402" RC_0402_YAG 319,1193 r270 top
R404 "RES SMD 10K OHM 1% 1/16W 0402" RC_0402_YAG 183,839 r270 bottom
R405 "RES SMD 10K OHM 1% 1/16W 0402" RC_0402_YAG 715.32,2242 r180 bottom
R406 "RES SMD 10K OHM 1% 1/16W 0402" RC_0402_YAG 184,1323.32 r90 bottom
R407 "RES SMD 10K OHM 1% 1/16W 0402" RC_0402_YAG 566,2243 r180 bottom
R408 "RES SMD 10K OHM 1% 1/16W 0402" RC_0402_YAG 566,2204 r0 bottom
R409 "RES SMD 1K OHM 0.1% 1/16W 0402" RC_0402_YAG 2317,550 r90 bottom
R410 "RES SMD 1K OHM 0.1% 1/16W 0402" RC_0402_YAG 276,852 r180 bottom
R411 "RES SMD 1K OHM 0.1% 1/16W 0402" RC_0402_YAG 258,1324 r90 bottom
R412 "RES SMD 10K OHM 1% 1/16W 0402" RC_0402_YAG 512,2329 r0 bottom
R413 "RES SMD 10K OHM 1% 1/16W 0402" RC_0402_YAG 346,585.32 r90 top
R414 "RES SMD 10K OHM 1% 1/16W 0402" RC_0402_YAG 736,1752 r270 top
R415 "RES SMD 10K OHM 1% 1/16W 0402" RC_0402_YAG 397,2207.32 r90 top
R416 "RES SMD 10K OHM 1% 1/16W 0402" RC_0402_YAG 697,1752 r270 top
R417 "RES SMD 10K OHM 1% 1/16W 0402" RC_0402_YAG 658,1752 r270 top
R418 "RES SMD 10K OHM 1% 1/16W 0402" RC_0402_YAG 438,2207 r90 top
R419 "RES SMD 10K OHM 1% 1/16W 0402" RC_0402_YAG 654,2153 r90 top
R420 "RES SMD 100K OHM 0.1% 1/16W 0402" RC_0402_YAG 428,1157 r90 top
R421 "RES SMD 100K OHM 0.1% 1/16W 0402" RC_0402_YAG 466,1156.69 r90 top
R422 "RES SMD 10K OHM 1% 1/16W 0402" RC_0402_YAG 390,1157 r90 top
R423 "RES 32.4K OHM 1% 1/16W 0402" RC_0402_YAG 535,1147 r180 top
R424 "RES SMD 100K OHM 0.1% 1/16W 0402" RC_0402_YAG 535,1108 r180 top
R425 "RES SMD 100K OHM 0.1% 1/16W 0402" RC_0402_YAG 638,922 r180 top
SW300 "SWITCH TACTILE SPST-NO 0.05A 16V" SW_PTS810_SJM_250_SMTR_LFS 447,970 r180 top
SW301 "SWITCH TACTILE SPST-NO 0.05A 16V" SW_PTS810_SJM_250_SMTR_LFS 1208,1653 r0 top
SW400 "SWITCH TACTILE SPST-NO 0.05A 12V" SW_TL1014BF220QG 94,938 r90 bottom
SW401 "SWITCH TACTILE SPST-NO 0.05A 12V" SW_TL1014BF220QG 2478,419 r270 bottom
SW402 "SWITCH TACTILE SPST-NO 0.05A 12V" SW_TL1014BF220QG 94,1233 r90 bottom
TP100 "TEST_POINT" TEST_POINT 3296.15,27.45 r90 top
TP101 "TEST_POINT" TEST_POINT 2976.15,27.45 r90 top
TP102 "TEST_POINT" TEST_POINT 2636.15,27.45 r90 top
TP200 "TEST_POINT" TEST_POINT 6747.15,606.45 r90 top
TP201 "TEST_POINT" TEST_POINT 640,405 r90 bottom
TP202 "TEST_POINT" TEST_POINT 6397.15,606.45 r90 top
TP203 "TEST_POINT" TEST_POINT 6047.15,606.45 r90 top
TP204 "TEST_POINT" TEST_POINT 3556,-1896 r90 bottom
TP205 "TEST_POINT" TEST_POINT 5376.15,606.45 r90 top
TP206 "TEST_POINT" TEST_POINT 5026.15,606.45 r90 top
TP207 "TEST_POINT" TEST_POINT 6751,1052 r90 bottom
TP208 "TEST_POINT" TEST_POINT 6173,1172 r90 bottom
TP209 "TEST_POINT" TEST_POINT 4336.15,606.45 r90 top
TP210 "TEST_POINT" TEST_POINT 5306,474 r90 bottom
TP211 "TEST_POINT" TEST_POINT 5726.15,606.45 r90 top
TP212 "TEST_POINT" TEST_POINT 6096,1090 r90 bottom
TP213 "TEST_POINT" TEST_POINT 4686.15,606.45 r90 top
TP214 "TEST_POINT" TEST_POINT 5247,411 r90 bottom
TP215 "TEST_POINT" TEST_POINT 3463,-1896 r90 bottom
TP216 "TEST_POINT" TEST_POINT 3656.15,606.45 r90 top
TP217 "TEST_POINT" TEST_POINT 3316.15,606.45 r90 top
TP218 "TEST_POINT" TEST_POINT 6962,1319 r90 bottom
TP219 "TEST_POINT" TEST_POINT 3996.15,606.45 r90 top
TP220 "TEST_POINT" TEST_POINT -353,2275 r90 bottom
TP221 "TEST_POINT" TEST_POINT 2986.15,606.45 r90 top
TP222 "TEST_POINT" TEST_POINT 2636.15,606.45 r90 top
TP300 "TEST_POINT" TEST_POINT 3836.15,220.45 r90 top
TP301 "TEST_POINT" TEST_POINT 3336.15,220.45 r90 top
TP302 "TEST_POINT" TEST_POINT 2986.15,220.45 r90 top
TP303 "TEST_POINT" TEST_POINT 2636.15,220.45 r90 top
TP402 "TEST_POINT" TEST_POINT -263,2371 r90 bottom
TP403 "TEST_POINT" TEST_POINT 3336.15,413.45 r90 top
TP404 "TEST_POINT" TEST_POINT 2986.15,413.45 r90 top
TP405 "TEST_POINT" TEST_POINT 2636.15,413.45 r90 top
TP406 "TEST_POINT" TEST_POINT 591,1261 r90 top
U100 "IC OP AMP 2CH 8-SON" SON50P300X300X80-9N200X120 2326.78,1127 r180 bottom
U101 "IC OP AMP 2CH 8-SON" SON50P300X300X80-9N200X120 1975.78,1095 r180 bottom
U102 "IC OP AMP 2CH 8-SON" SON50P300X300X80-9N200X120 2172,1440 r180 bottom
U103 "IC OP AMP 2CH 10-VSON" IC_OPA1622IDRCR 2076.94,1781 r90 bottom
U200 "IC REG BUCK BST ADJ 600MA 10MSOP" SOP50P490X110-10N 1581,2210 r270 top
U201 "IC REG CUK ADJ 250MA TSOT23-6" TSOT-23_S6 1229,2285.01 r180 bottom
U202 "IC BATT CHG LI-ION 1CELL 24VQFN" QFN50P400X400X100-25N 461,229 r90 bottom
U203 "IC REG LIN NEG ADJ 200MA 12-DFN" 05-08-1725_ADI 1706,1772 r270 bottom
U204 "IC REG LIN POS ADJ 200MA 10DFN" VREG_LT3042EDD#PBF 1636,1464 r270 top
U205 "IC REG BUCK BST ADJ 600MA 10MSOP" SOP50P490X110-10N 1473,389 r90 bottom
U206 "IC REG LIN POS ADJ 200MA 10DFN" VREG_LT3042EDD#PBF 1708,762 r0 top
U300 "IC FLASH 64MBIT SPI/QUAD 8WSON" SON127P600X500X80-9N 1552,1092 r180 bottom
U301 "ESP32-S3" IC_ESP32-S3 1137.25,1139.4 r0 top
U400 "IC LED DRIVER RGLTR 30MA 16VQFN" VQFN016V3030_ROM 415,1291 r90 top
Y100 "XTAL OSC XO 22.5792MHZ CMOS SMD" OSC_ECS-2520MVLC-225.792-CN-TR 2407.58,880.54 r180 top
Y101 "XTAL OSC TCXO 24.5760MHZ HCMOS" XTAL_ASTX-H11-24.576MHZ-T 2412,748 r90 top

## Footprints (in the part's own frame and the unit in brackets; to place one, negate y for a bottom-side part, rotate by r counter-clockwise, add the part's x,y. Pads: shape width x height; smd on the part's side, far side on the other; paste and mask are expansions set on the pad)
05-08-1725_ADI [mm]
  rrect12% 0.7x0.25 smd paste+0 mask+0.05: 1(-1.445,1.125) 2(-1.445,0.675) 3(-1.445,0.225) 4(-1.445,-0.225) 5(-1.445,-0.675) 6(-1.445,-1.125) 7(1.445,-1.125) 8(1.445,-0.675) 9(1.445,-0.225) 10(1.445,0.225) 11(1.445,0.675) 12(1.445,1.125)
  rrect12% 1.65x2.38 smd paste+0 mask+0.05: 13(0,0)
  silkscreen extent -1.68,-1.68 1.68,1.68, body extent -1.55,-1.55 1.55,1.55, height 0.81
AMPHENOL_F32D-1A7Y1-21050 [mm]
  rect 0.25x1.3 smd paste+0 mask+0.05: 1(-12.25,3.08) 2(-11.75,3.08) 3(-11.25,3.08) 4(-10.75,3.08) 5(-10.25,3.08) 6(-9.75,3.08) 7(-9.25,3.08) 8(-8.75,3.08) 9(-8.25,3.08) 10(-7.75,3.08) 11(-7.25,3.08) 12(-6.75,3.08) 13(-6.25,3.08) 14(-5.75,3.08) 15(-5.25,3.08) 16(-4.75,3.08) 17(-4.25,3.08) 18(-3.75,3.08) 19(-3.25,3.08) 20(-2.75,3.08) 21(-2.25,3.08) 22(-1.75,3.08) 23(-1.25,3.08) 24(-0.75,3.08) 25(-0.25,3.08) 26(0.25,3.08) 27(0.75,3.08) 28(1.25,3.08) 29(1.75,3.08) 30(2.25,3.08) 31(2.75,3.08) 32(3.25,3.08) 33(3.75,3.08) 34(4.25,3.08) 35(4.75,3.08) 36(5.25,3.08) 37(5.75,3.08) 38(6.25,3.08) 39(6.75,3.08) 40(7.25,3.08) 41(7.75,3.08) 42(8.25,3.08) 43(8.75,3.08) 44(9.25,3.08) 45(9.75,3.08) 46(10.25,3.08) 47(10.75,3.08) 48(11.25,3.08) 49(11.75,3.08) 50(12.25,3.08)
  rect 1.73x2.8 smd paste+0 mask+0.05: S1(-14.19,0) S2(14.19,0)
  silkscreen extent -14.25,-2.05 14.25,4.75, body extent -14.55,-1.64 14.55,3.68, height 3.15
CAP_298D225X0016M2T [mm]
  rrect12% 0.7x0.61 smd mask+0.05: 1(-0.67,0) 2(0.67,0)
  silkscreen extent -1.57,-0.55 1.15,0.55, body extent -0.8,-0.43 0.8,0.43, height 0.9
CAP_GCM/R15 [mm]
  rrect12% 0.5x0.6 smd mask+0.05: 1(-0.5,0) 2(0.5,0)
  silkscreen extent -0.91,-0.45 0.91,0.45, body extent -0.5,-0.25 0.5,0.25, height 0.6
CAP_GCM/R18 [mm]
  rrect12% 0.725x0.9 smd mask+0.05: 1(0.763,0) 2(-0.763,0)
  silkscreen extent -1.31,-0.61 1.31,0.61, body extent -0.8,-0.4 0.8,0.4, height 1
CAP_GCM/R21 [mm]
  rrect12% 0.7x1.3 smd mask+0.05: 1(-0.95,0) 2(0.95,0)
  silkscreen extent -1.45,-0.77 1.45,0.78, body extent -1,-0.63 1,0.63, height 1.4
CAP_GCM/R32 [mm]
  rrect12% 1.1x2.05 smd mask+0.05: 1(-1.341,0) 2(1.341,0)
  silkscreen extent -2.1,-1.25 2.1,1.25, body extent -1.6,-1.25 1.6,1.25, height 2.65
CAP_GJM15 [mm]
  rrect12% 0.4x0.5 smd mask+0.05: 1(-0.4,0) 2(0.4,0)
  silkscreen extent -0.75,-0.4 0.75,0.4, body extent -0.5,-0.25 0.5,0.25, height 0.55
CAP_GRM03 [mm]
  rrect12% 0.3x0.35 smd mask+0.05: 1(-0.275,0) 2(0.275,0)
  silkscreen extent -0.55,-0.3 0.55,0.3, body extent -0.31,-0.15 0.31,0.15, height 0.33
CAP_GRM15 [mm]
  rrect12% 0.45x0.6 smd mask+0.05: 1(-0.5,0) 2(0.5,0)
  silkscreen extent -0.91,-0.45 0.91,0.45, body extent -0.5,-0.25 0.5,0.25, height 0.6
CAPC1005X60N [mm]
  rrect12% 0.425x0.6 smd mask+0.05: 1(-0.425,0) 2(0.425,0)
  silkscreen extent -0.78,-0.43 0.78,0.43, body extent -0.5,-0.25 0.5,0.25, height 0.6
"CAPC2012X140N - CUT" [mm]
  rrect12% 1x0.45 smd mask+0.05: 1(-1.1,0.33) 2(-1.1,-0.33) 3(1.1,0.33) 4(1.1,-0.33)
  silkscreen extent -1.75,-0.75 1.75,0.75, body extent -1,-0.63 1,0.63, height 1.4
CONN_505567_03_MOL [mil]
  rect 33x51 smd paste+0 mask+4.02: 1(49.21,-69.07) 2(0,-69.07) 3(-49.21,-69.07)
  rect 55x89 smd paste+0 mask+4.02: 4(-124.02,21.28) 5(124.02,21.28)
  silkscreen extent -143,-87 143,88, body extent -138,-83 138,82, height 153
CRYST_ECS-400 [mm]
  rrect12% 0.85x0.75 smd mask+0.05: 1(-0.675,0.525) 2(0.675,0.525) 3(0.675,-0.525) 4(-0.675,-0.525)
  silkscreen extent -1.25,-1.1 1.25,1.1, body extent -1,-0.8 1,0.8, height 0.5
CUI_MSD-1-A [mm]
  rect 0.7x1.6 smd mask+0.05: 1(2.25,7.75) 2(1.15,7.75) 3(0.05,7.75) 4(-1.05,7.75) 5(-2.15,7.75) 6(-3.25,7.75) 7(-4.35,7.75) 8(-5.45,7.75) CD(-6.55,7.75)
  rect 1.2x1.8 smd mask+0.05: G1(-7.75,6.45)
  rect 1.6x1.5 smd mask+0.05: G2(6.85,6.7)
  rect 1.2x2.2 smd mask+0.05: G3(-7.75,-2.85) G4(7.75,-2.85)
  round 1 hole 1 unplated: ""(-4.95,-3.25) ""(3.05,-3.25)
  silkscreen extent -7.42,-7.25 7.42,7.25, body extent -8.12,-7.32 8.03,7.73, height 1.85
CUI_SJ1-3535NS [mm]
  oval 1.4x2.8 hole 1 slot 2 at 90 deg: 1(-9.144,4.064) 2(-6.744,6.064) 3(-1.244,6.064) 4(2.456,4.064) 5(-3.044,4.064)
  oval 2.8x1.4 hole 1 slot 2 at 0 deg: SH1(-8.144,-0.236) SH2(0.756,-0.236) SH3(0.756,8.464)
  silkscreen extent -10.64,-0.74 4.06,9.91, body extent -14.26,-0.68 4.1,9.02, height 12.65
"DIOM1006X40N - onsemi" [mm]
  rect 0.36x0.25 smd mask+0.05: A(0.42,0) C(-0.42,0)
  silkscreen extent -0.74,-0.38 0.74,0.38, body extent -0.5,-0.3 0.5,0.3, height 0.4
DIOM5226X230N [mm]
  rrect25% 2.5x1.7 smd: A(-2,0) C(2,0)
  silkscreen extent -4.4,-1.3 2.15,1.3, body extent -2.6,-1.3 2.6,1.3, height 2.4
EN12-VS_TTE [mm]
  round 1.5 hole 1 paste-2539.97 mask+0: 1(-5,-8.738) 2(-2.5,-8.738) 3(0,-8.738) 4(-5,-6.238) 5(0,-6.238)
  rrect50% 4x4 hole 3 paste-2539.97 mask-1.003: 6(3.901,-5.239) 7(-8.901,-5.239)
  body extent -8.77,-22.9 3.81,-2.9, height 16.58
GCT_USB4085-GF-A_REVA4 [mm]
  round 0.65 hole 0.4: A1(-2.975,4.36) A4(-2.125,4.36) A5(-1.275,4.36) A6(-0.425,4.36) A7(0.425,4.36) A8(1.275,4.36) A9(2.125,4.36) A12(2.975,4.36) B1(2.975,3.01) B4(2.125,3.01) B5(1.275,3.01) B6(0.425,3.01) B7(-0.425,3.01) B8(-1.275,3.01) B9(-2.125,3.01) B12(-2.975,3.01)
  oval 0.9x1.7 hole 0.6 slot 1.4 at 90 deg: S1(-4.325,0) S2(4.325,0)
  oval 0.9x2.4 hole 0.6 slot 2.1 at 90 deg: S3(-4.325,3.38) S4(4.325,3.38)
  silkscreen extent -4.47,-1.74 4.47,1.85, body extent -4.47,-4.25 4.47,4.92, height 3.46
IC_ESD122DMXR [mm]
  rrect50% 0.2x0.2 smd paste+0.01 mask+0.05: 1(-0.15,0) 2(0.15,-0.34) 3(0.15,0.34)
  silkscreen extent -0.74,-0.55 0.35,0.55, body extent -0.3,-0.5 0.3,0.5, height 0.4
IC_ESP32-S3 [mm]
  rect 0.65x0.22 smd mask+0.05: 1(-3.425,2.6) 2(-3.425,2.2) 3(-3.425,1.8) 4(-3.425,1.4) 5(-3.425,1) 6(-3.425,0.6) 7(-3.425,0.2) 8(-3.425,-0.2) 9(-3.425,-0.6) 10(-3.425,-1) 11(-3.425,-1.4) 12(-3.425,-1.8) 13(-3.425,-2.2) 14(-3.425,-2.6) 29(3.425,-2.6) 30(3.425,-2.2) 31(3.425,-1.8) 32(3.425,-1.4) 33(3.425,-1) 34(3.425,-0.6) 35(3.425,-0.2) 36(3.425,0.2) 37(3.425,0.6) 38(3.425,1) 39(3.425,1.4) 40(3.425,1.8) 41(3.425,2.2) 42(3.425,2.6)
  rect 0.22x0.65 smd mask+0.05: 15(-2.6,-3.425) 16(-2.2,-3.425) 17(-1.8,-3.425) 18(-1.4,-3.425) 19(-1,-3.425) 20(-0.6,-3.425) 21(-0.2,-3.425) 22(0.2,-3.425) 23(0.6,-3.425) 24(1,-3.425) 25(1.4,-3.425) 26(1.8,-3.425) 27(2.2,-3.425) 28(2.6,-3.425) 43(2.6,3.425) 44(2.2,3.425) 45(1.8,3.425) 46(1.4,3.425) 47(1,3.425) 48(0.6,3.425) 49(0.2,3.425) 50(-0.2,3.425) 51(-0.6,3.425) 52(-1,3.425) 53(-1.4,3.425) 54(-1.8,3.425) 55(-2.2,3.425) 56(-2.6,3.425)
  rect 1x1 smd paste-2539.97 mask+0.05: 57(-1.5,-1.5) 57(-1.5,0) 57(-1.5,1.5) 57(0,-1.5) 57(0,1.5) 57(1.5,-1.5) 57(1.5,0) 57(1.5,1.5)
  round 0.7 hole 0.4 mask+0: 57(-1.5,-0.75) 57(-1.5,0.75) 57(-0.75,-1.5) 57(-0.75,0) 57(-0.75,1.5) 57(0,-0.75) 57(0,0.75) 57(0.75,-1.5) 57(0.75,0) 57(0.75,1.5) 57(1.5,-0.75) 57(1.5,0.75)
  rect 1x1 smd mask+0.05: 57(0,0)
  silkscreen extent -3.5,-3.5 3.5,3.5, body extent -3.5,-3.5 3.5,3.5, height 0.9
IC_OPA1622IDRCR [mm]
  rrect25% 0.6x0.24 smd mask+0.07: 1(-1.4,1) 2(-1.4,0.5) 3(-1.4,0) 4(-1.4,-0.5) 5(-1.4,-1) 6(1.4,-1) 7(1.4,-0.5) 8(1.4,0) 9(1.4,0.5) 10(1.4,1)
  round 0.3 hole 0.2 mask+0: 11(-0.575,0) 11(0,-0.95) 11(0,0.95) 11(0.575,0)
  round 0.025 smd paste+0 mask+0.07: 11(0,0)
  L1 (SIG/PWR) region: 0.375,1.2 0.825,1.2 0.825,-1.2 0.375,-1.2 0.375,-1.7 0.125,-1.7 0.125,-1.2 -0.125,-1.2 -0.125,-1.7 -0.375,-1.7 -0.375,-1.2 -0.825,-1.2 -0.825,1.2 -0.375,1.2 -0.375,1.7 -0.125,1.7 -0.125,1.2 0.125,1.2 0.125,1.7 0.375,1.7
  silkscreen extent -1.5,-1.5 1.5,1.5, body extent -1.5,-1.5 1.5,1.5, height 1
IND_LQP03HQ2N0B02D [mm]
  rect 0.3x0.275 smd mask+0.05: 1(-0.3,0) 2(0.3,0)
  silkscreen extent -0.6,-0.28 0.6,0.28, body extent -0.3,-0.15 0.3,0.15, height 0.42
IND_LQW32FT220M2HL [mm]
  rrect12% 0.9x2.5 smd mask+0.05: 1(-1.55,0) 2(1.55,0)
  silkscreen extent -2.28,-1.48 2.28,1.48
IND_SRP4030FA [mm]
  rect 3.8x1.1 smd paste+0 mask+0.1: 1(0,-1.25) 2(0,1.25)
  silkscreen extent -2.25,-2.25 2.25,2.25, body extent -2.05,-2.05 2.05,2.05, height 2.86
IND_XGL5050 [mm]
  rrect12% 1.18x4.7 smd mask+0.05: 1(-1.655,0) 2(1.655,0)
  silkscreen extent -2.75,-2.88 2.75,2.88, body extent -2.74,-2.84 2.74,2.84, height 5.15
INDC2012X100N [mm]
  rect 0.8x1.4 smd: 1(-0.8,0) 2(0.8,0)
  body extent -1,-0.6 1,0.6, height 1
LEDM1608X80 [mm]
  rect 0.8x0.8 smd: A(0.75,0) C(-0.75,0)
  silkscreen extent -1.37,-0.58 1.37,0.61, body extent -0.8,-0.4 0.8,0.4, height 0.8
OSC_ECS-2520MVLC-225.792-CN-TR [mm]
  rect 0.9x0.8 smd mask+0.05: 1(-0.925,-0.725) 2(0.925,-0.725) 3(0.925,0.725) 4(-0.925,0.725)
  silkscreen extent -0.22,-1 0.22,1, body extent -1.25,-1 1.25,1, height 0.9
QFN40P300X500X80-31N-D [mm]
  rrect12% 0.75x0.2 smd mask+0.05: 1(-1.5,1.8) 2(-1.5,1.4) 3(-1.5,1) 4(-1.5,0.6) 5(-1.5,0.2) 6(-1.5,-0.2) 7(-1.5,-0.6) 8(-1.5,-1) 9(-1.5,-1.4) 10(-1.5,-1.8) 16(1.5,-1.8) 17(1.5,-1.4) 18(1.5,-1) 19(1.5,-0.6) 20(1.5,-0.2) 21(1.5,0.2) 22(1.5,0.6) 23(1.5,1) 24(1.5,1.4) 25(1.5,1.8)
  rrect12% 0.2x0.75 smd mask+0.05: 11(-0.8,-2.5) 12(-0.4,-2.5) 13(0,-2.5) 14(0.4,-2.5) 15(0.8,-2.5) 26(0.8,2.5) 27(0.4,2.5) 28(0,2.5) 29(-0.4,2.5) 30(-0.8,2.5)
  rrect12% 1.8x3.8 smd mask+0.05: 31(0,0)
  silkscreen extent -1.97,2.3 -1.78,2.5, body extent -1.55,-2.55 1.55,2.55, height 0.8
QFN50P400X400X100-25N [mm]
  rrect40% 0.58x0.24 smd mask+0.07: 1(-1.913,1.25) 2(-1.913,0.75) 3(-1.913,0.25) 4(-1.913,-0.25) 5(-1.913,-0.75) 6(-1.913,-1.25) 13(1.913,-1.25) 14(1.913,-0.75) 15(1.913,-0.25) 16(1.913,0.25) 17(1.913,0.75) 18(1.913,1.25)
  rrect40% 0.24x0.58 smd mask+0.07: 7(-1.25,-1.913) 8(-0.75,-1.913) 9(-0.25,-1.913) 10(0.25,-1.913) 11(0.75,-1.913) 12(1.25,-1.913) 19(1.25,1.913) 20(0.75,1.913) 21(0.25,1.913) 22(-0.25,1.913) 23(-0.75,1.913) 24(-1.25,1.913)
  rrect3% 2.7x2.7 smd paste-2539.97 mask+0.07: 25(0,0)
  silkscreen extent -3.07,-2 2,2, body extent -2,-2 2,2, height 1
RC_0201_YAG [mm]
  rrect12% 0.35x0.4 smd mask+0.05: 1(0.325,0) 2(-0.325,0)
  silkscreen extent -0.65,-0.35 0.65,0.35, body extent -0.3,-0.15 0.3,0.15, height 0.26
RC_0402_YAG [mm]
  rrect12% 0.5x0.6 smd mask+0.05: 1(-0.5,0) 2(0.5,0)
  silkscreen extent -0.9,-0.43 0.9,0.43, body extent -0.5,-0.25 0.5,0.25, height 0.4
RC_0603_YAG [mm]
  rrect12% 0.9x0.8 smd mask+0.05: 1(0.85,0) 2(-0.85,0)
  silkscreen extent -1.43,-0.5 1.43,0.5, body extent -0.8,-0.4 0.8,0.4, height 0.55
RC_0805_YAG [mm]
  rrect12% 0.9x1.2 smd mask+0.05: 1(1.05,0) 2(-1.05,0)
  silkscreen extent -1.65,-0.77 1.65,0.78, body extent -1,-0.63 1,0.63, height 0.65
SON50P300X300X80-9N200X120 [mm]
  rrect40% 0.7x0.25 smd mask+0.07: 1(-1.35,0.75) 2(-1.35,0.25) 3(-1.35,-0.25) 4(-1.35,-0.75) 5(1.35,-0.75) 6(1.35,-0.25) 7(1.35,0.25) 8(1.35,0.75)
  round 0.5 hole 0.25 mask+0: 9(-0.35,0) 9(0.008,-0.663) 9(0.35,0)
  rrect8% 1.2x2 smd paste+0 mask+0.07: 9(0,0)
  silkscreen extent -1.55,-1.55 1.55,1.55, body extent -1.5,-1.5 1.5,1.5, height 0.8
SON127P600X500X80-9N [mm]
  rrect12% 1x0.4 smd mask+0.05: 1(-3,-1.905) 2(-3,-0.635) 3(-3,0.635) 4(-3,1.905) 5(3,1.905) 6(3,0.635) 7(3,-0.635) 8(3,-1.905)
  rrect12% 3.4x4 smd mask+0.05: 9(0,0)
SOP50P490X110-10N [mm]
  rect 0.889x0.305 smd paste+0 mask+0.05: 1(-2.107,1) 2(-2.107,0.5) 3(-2.107,0) 4(-2.107,-0.5) 5(-2.107,-1) 6(2.107,-1) 7(2.107,-0.5) 8(2.107,0) 9(2.107,0.5) 10(2.107,1)
  silkscreen extent -1.5,-1.5 1.5,1.5, body extent -2.45,-1.5 2.45,1.5, height 1.1
SOT65P210X110-3N [mm]
  rrect25% 0.95x0.4 smd paste+0 mask+0.102: 1(-1.1,0.65) 2(-1.1,-0.65) 3(1.1,0)
  silkscreen extent -1.81,-1.25 1.81,1.25, body extent -1.05,-1 1.05,1, height 1.1
SOT-23_MCC [mm]
  rrect12% 0.8x0.9 smd paste+0 mask+0.102: 1(-0.95,-1) 2(0.95,-1) 3(0,1)
  silkscreen extent -1.75,-1.75 1.75,1.75, body extent -1.46,-1.18 1.46,1.18, height 1.22
SW_PTS810_SJM_250_SMTR_LFS [mm]
  rect 1.05x0.65 smd mask+0.05: 1(-2.075,1.075) 2(2.075,1.075) 3(-2.075,-1.075) 4(2.075,-1.075)
  silkscreen extent -3.2,-1.62 2.1,1.62, body extent -2.3,-1.6 2.3,1.6, height 2.7
SW_TL1014BF220QG [mm]
  rect 1.2x1 smd mask+0.05: 1(2.8,0.85) 2(2.8,-0.85) 3(-2.8,0.85) 4(-2.8,-0.85)
  body extent -3.2,-2.75 3.2,1.75, height 1.65
TEST_POINT [mm]
  round 1 smd mask+0.05: 1(0,0)
TSOT-23_S6 [mm]
  rrect12% 1.22x0.62 smd paste+0 mask+0.05: 1(-1.31,0.95) 2(-1.31,0) 3(-1.31,-0.95) 4(1.31,-0.95) 5(1.31,0) 6(1.31,0.95)
  body extent -1.4,-1.45 1.4,1.45, height 1
UDFN10_517BB_ONS [mm]
  rect 0.5x0.25 smd paste+0 mask+0.05: 1(-0.4,1) 2(-0.4,0.5) 4(-0.4,-0.5) 5(-0.4,-1) 6(0.4,-1) 7(0.4,-0.5) 9(0.4,0.5) 10(0.4,1)
  rect 0.5x0.45 smd paste+0 mask+0.05: 3(-0.4,0) 8(0.4,0)
  silkscreen extent -1.14,-1.35 0.85,1.35, body extent -0.5,-1.25 0.5,1.25, height 0.55
VQFN016V3030_ROM [mm]
  rrect12% 0.711x0.25 smd paste+0 mask+0.05: 1(-1.448,0.75) 2(-1.448,0.25) 3(-1.448,-0.25) 4(-1.448,-0.75) 9(1.448,-0.75) 10(1.448,-0.25) 11(1.448,0.25) 12(1.448,0.75)
  rrect12% 0.25x0.711 smd paste+0 mask+0.05: 5(-0.75,-1.448) 6(-0.25,-1.448) 7(0.25,-1.448) 8(0.75,-1.448) 13(0.75,1.448) 14(0.25,1.448) 15(-0.25,1.448) 16(-0.75,1.448)
  rrect12% 1.4x1.4 smd paste+0 mask+0.05: 17(0,0)
  silkscreen extent -1.63,-1.63 1.63,1.63, body extent -1.5,-1.5 1.5,1.5, height 0.99
VREG_LT3042EDD#PBF [mm]
  rrect12% 0.7x0.25 smd mask+0.05: 1(-1.425,1) 2(-1.425,0.5) 3(-1.425,0) 4(-1.425,-0.5) 5(-1.425,-1) 6(1.425,-1) 7(1.425,-0.5) 8(1.425,0) 9(1.425,0.5) 10(1.425,1)
  rrect12% 1.65x2.38 smd paste-2 mask+0.05: 11(0,0)
  silkscreen extent -1.5,-1.5 1.5,1.5, body extent -1.5,-1.5 1.5,1.5, height 0.8
WE-CBF_0805_W4.0 [mm]
  rrect12% 0.9x1 smd paste+0 mask+0.05: 1(-1.05,0) 2(1.05,0)
  silkscreen extent -1.6,-0.65 1.6,0.65, body extent -1,-0.6 1,0.6, height 0.95
XTAL_ASTX-H11-24.576MHZ-T [mm]
  rect 1.3x1.1 smd mask+0.05: 1(-1.15,-0.95) 2(1.15,-0.95) 3(1.15,0.95) 4(-1.15,0.95)
  silkscreen extent -1.63,-1.27 1.63,1.27, body extent -1.6,-1.25 1.6,1.25, height 1.01

## Part data
B100: library part #1-053, Manufacturer 1="ESS Technology", Manufacturer Part Number 1=ES9038Q2M, Mouser Part Number=460-ES9038Q2M, <Termination>=SMD, AL-PN=#1-053, Creator Project=DAP, Footprint Status=Verified, Geometry.Height=0.8mm, Lead Time="9 Weeks", Manufacturer_Name="ESS Technology", Manufacturer_Part_Number=ES9038Q2M, Mouser Price/Stock=https://www.mouser.co.uk/ProductDetail/ESS-Technology/ES9038Q2M?qs=sPbYRqrBIVmdeUedURuuOw%3D%3D, PartType=IC, Status=Unverified, SubType=DAC, Supplier 1=Mouser, Supplier Label="Audio D/A Converter ICs Sabre 32 Reference Stereo low power audiophile DAC w/DOP", Supplier Part Number 1=460-ES9038Q2M, Type=Standard
C100 C101 C106 C107 C124 C138: library part #1-106, <Rating>=50V, <Tolerance>=0.01, <Value>=1.5nF, Manufacturer 1="Murata Electronics", Manufacturer Part Number 1=GCM1885C1H152FA16D, Supplier Part Number 1=490-18206-1-ND, <Footprint>=0603, <Spec>=C0G, <Termination>=SMD, AL-PN=#1-106, Creator Project=DAP, Footprint Status=Verified, Lead Time="21 Weeks", PartType=Capacitor, Status=Unverified, SubType=Ceramic, Supplier 1=Digikey, Supplier Label="1500 pF ±1% 50V Ceramic Capacitor C0G, NP0 0603 (1608 Metric)", Type=Standard
C102 C105 C113 C115 C119 C121 C122 C301 C305 C309 C312: library part #1-153, <Rating>=25V, <Tolerance>=0.1, <Value>=1uF, Manufacturer 1="Murata Electronics", Manufacturer Part Number 1=GRT155R61E105KE01D, Supplier Part Number 1=490-12263-1-ND, <Footprint>=0402, <Spec>=X5R, <Termination>=SMD, AL-PN=#1-153, Creator Project=DAP, Footprint Status=Verified, Lead Time="21 Weeks", PartType=Capacitor, Status=Unverified, SubType=Ceramic, Supplier 1=Digikey, Supplier Label="1 µF ±10% 25V Ceramic Capacitor X5R 0402 (1005 Metric)", Type=Standard